# Altium PCB CW341_KintexUSTarget.PcbDoc (part 1 of 7)
Units mil, origin at the board's own origin, x right, y up, seen from the top; angles counter-clockwise.
Board outline 4566.97 x 5485 mil, 6 copper layers (Top Layer, Layer 2 (GND), Layer 3 (sig), Layer 4 (sig), Layer 5 (PWR), Bottom Layer), stack 61.068 mil thick; 157 components, 262 nets, 1869 pads, 1478 vias.
Unrouted connection lines stored in the file: 128.
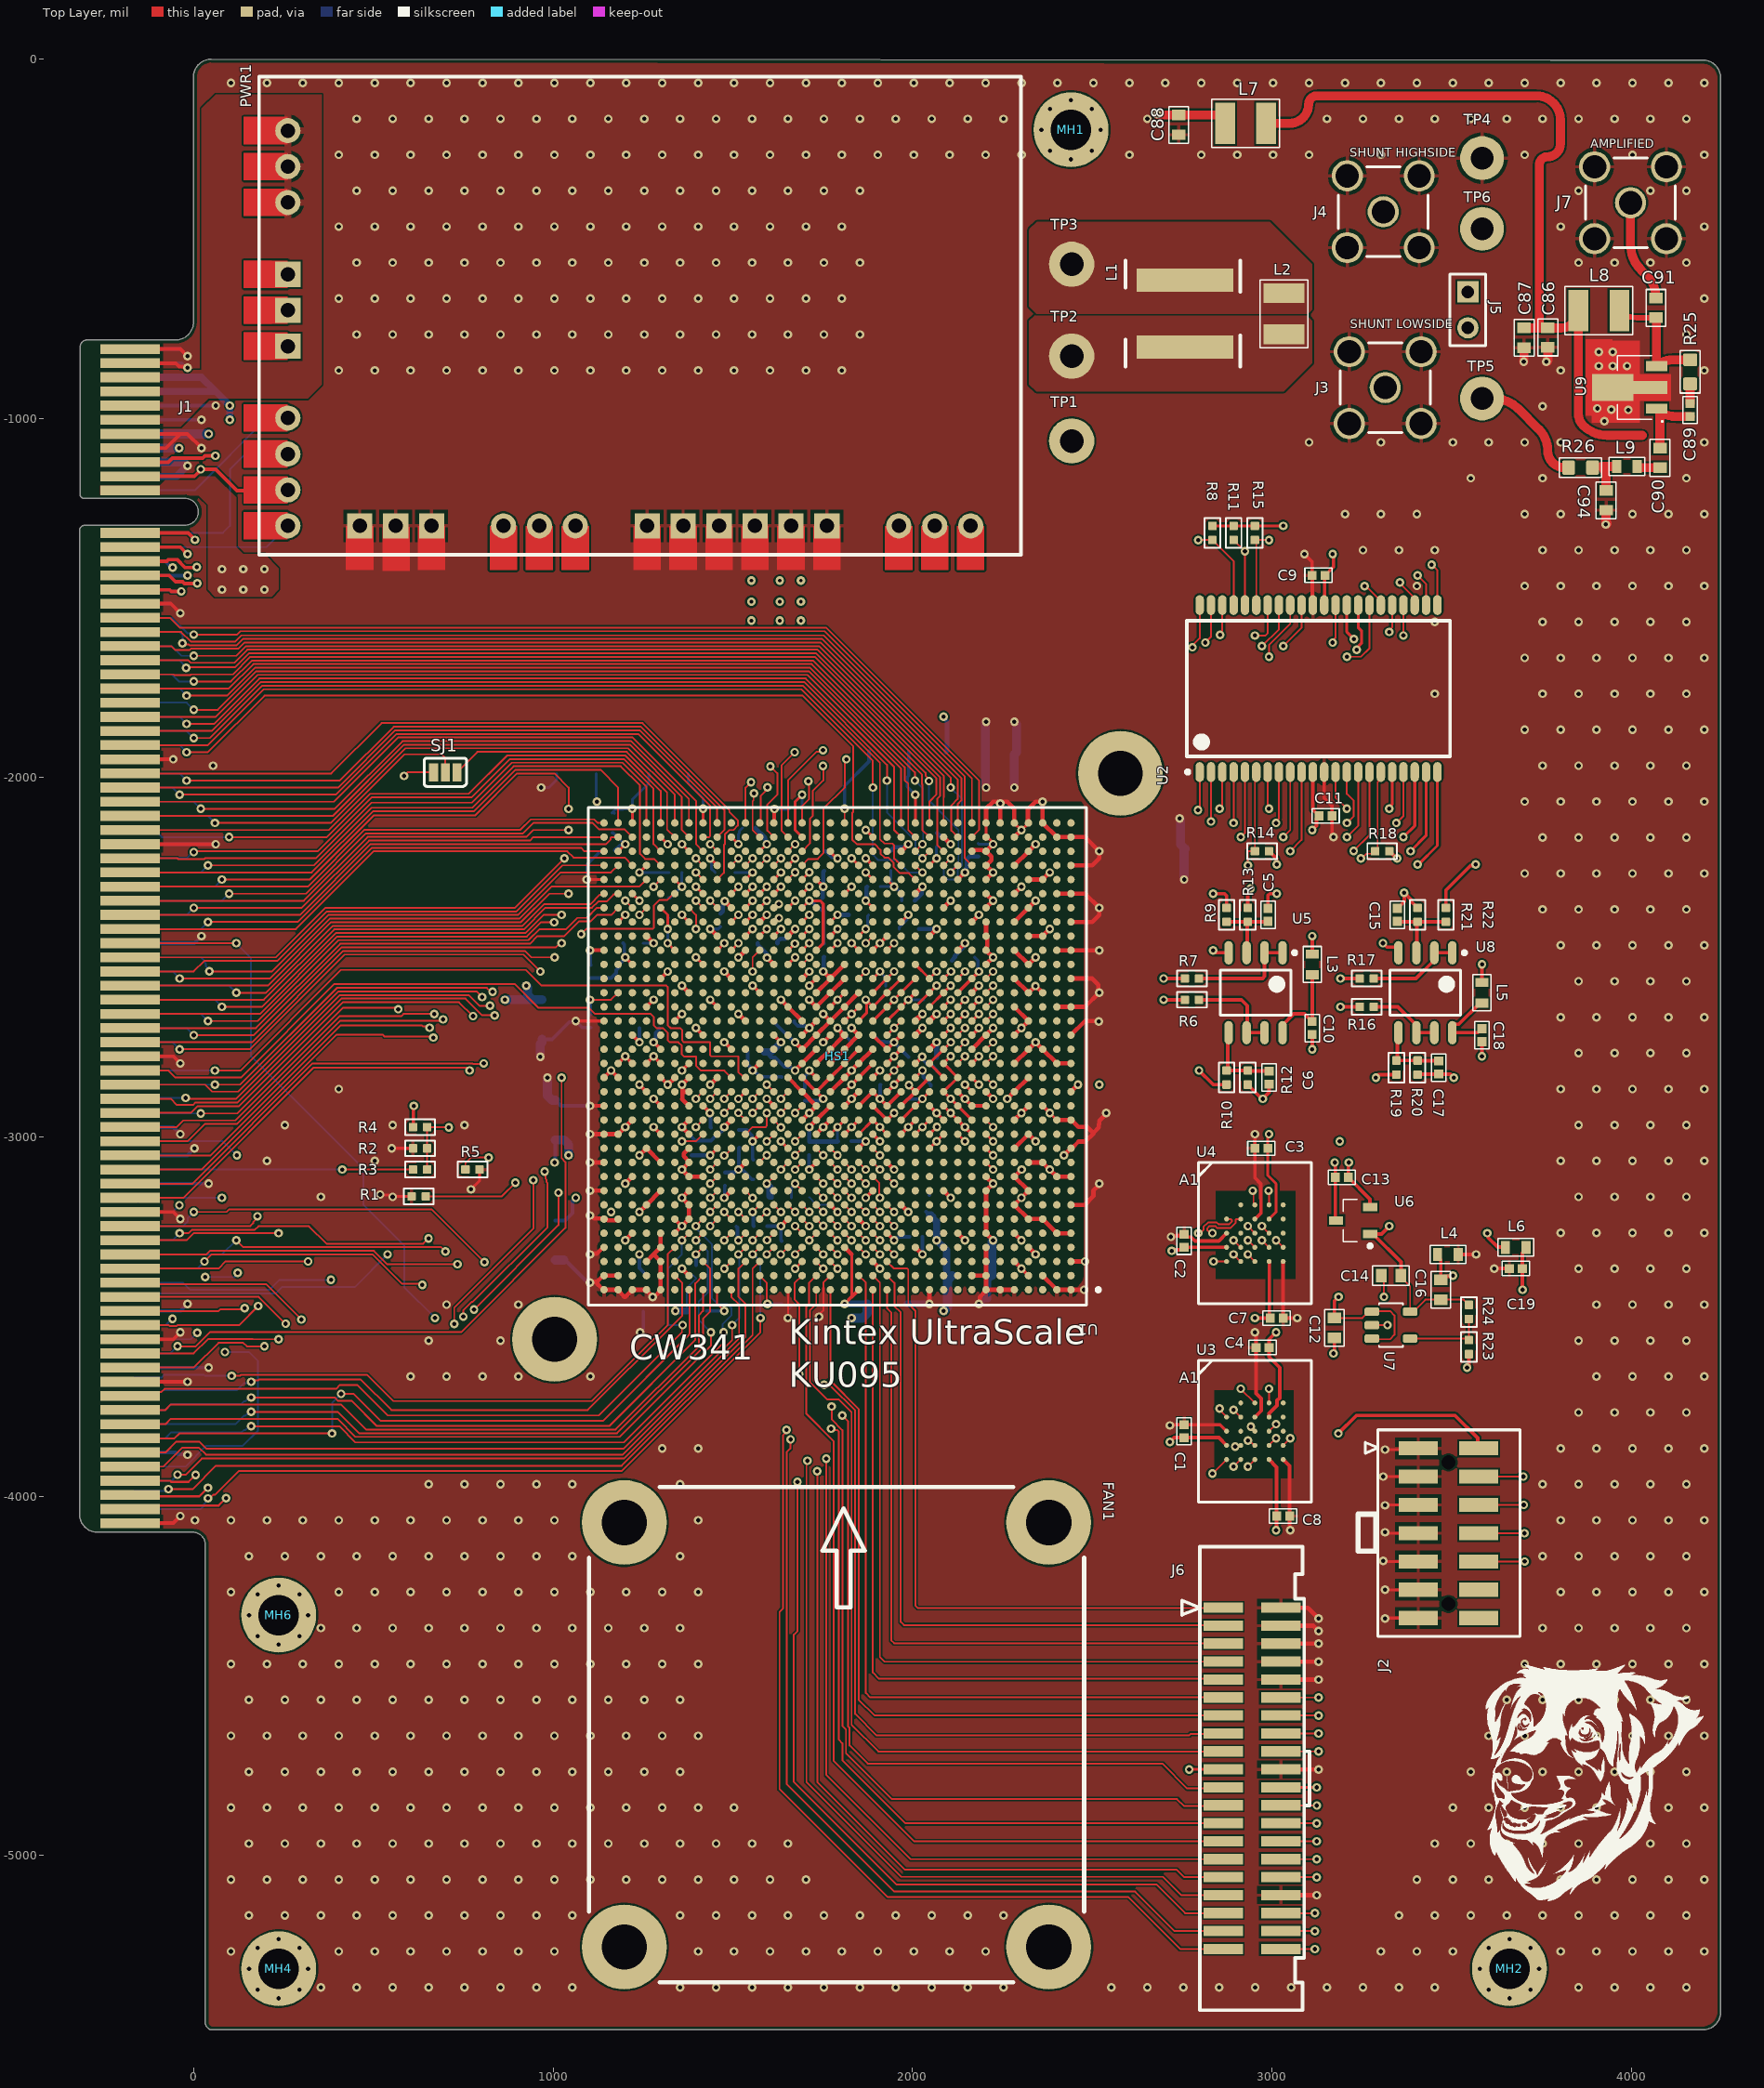
[diagram p0: Top Layer view]
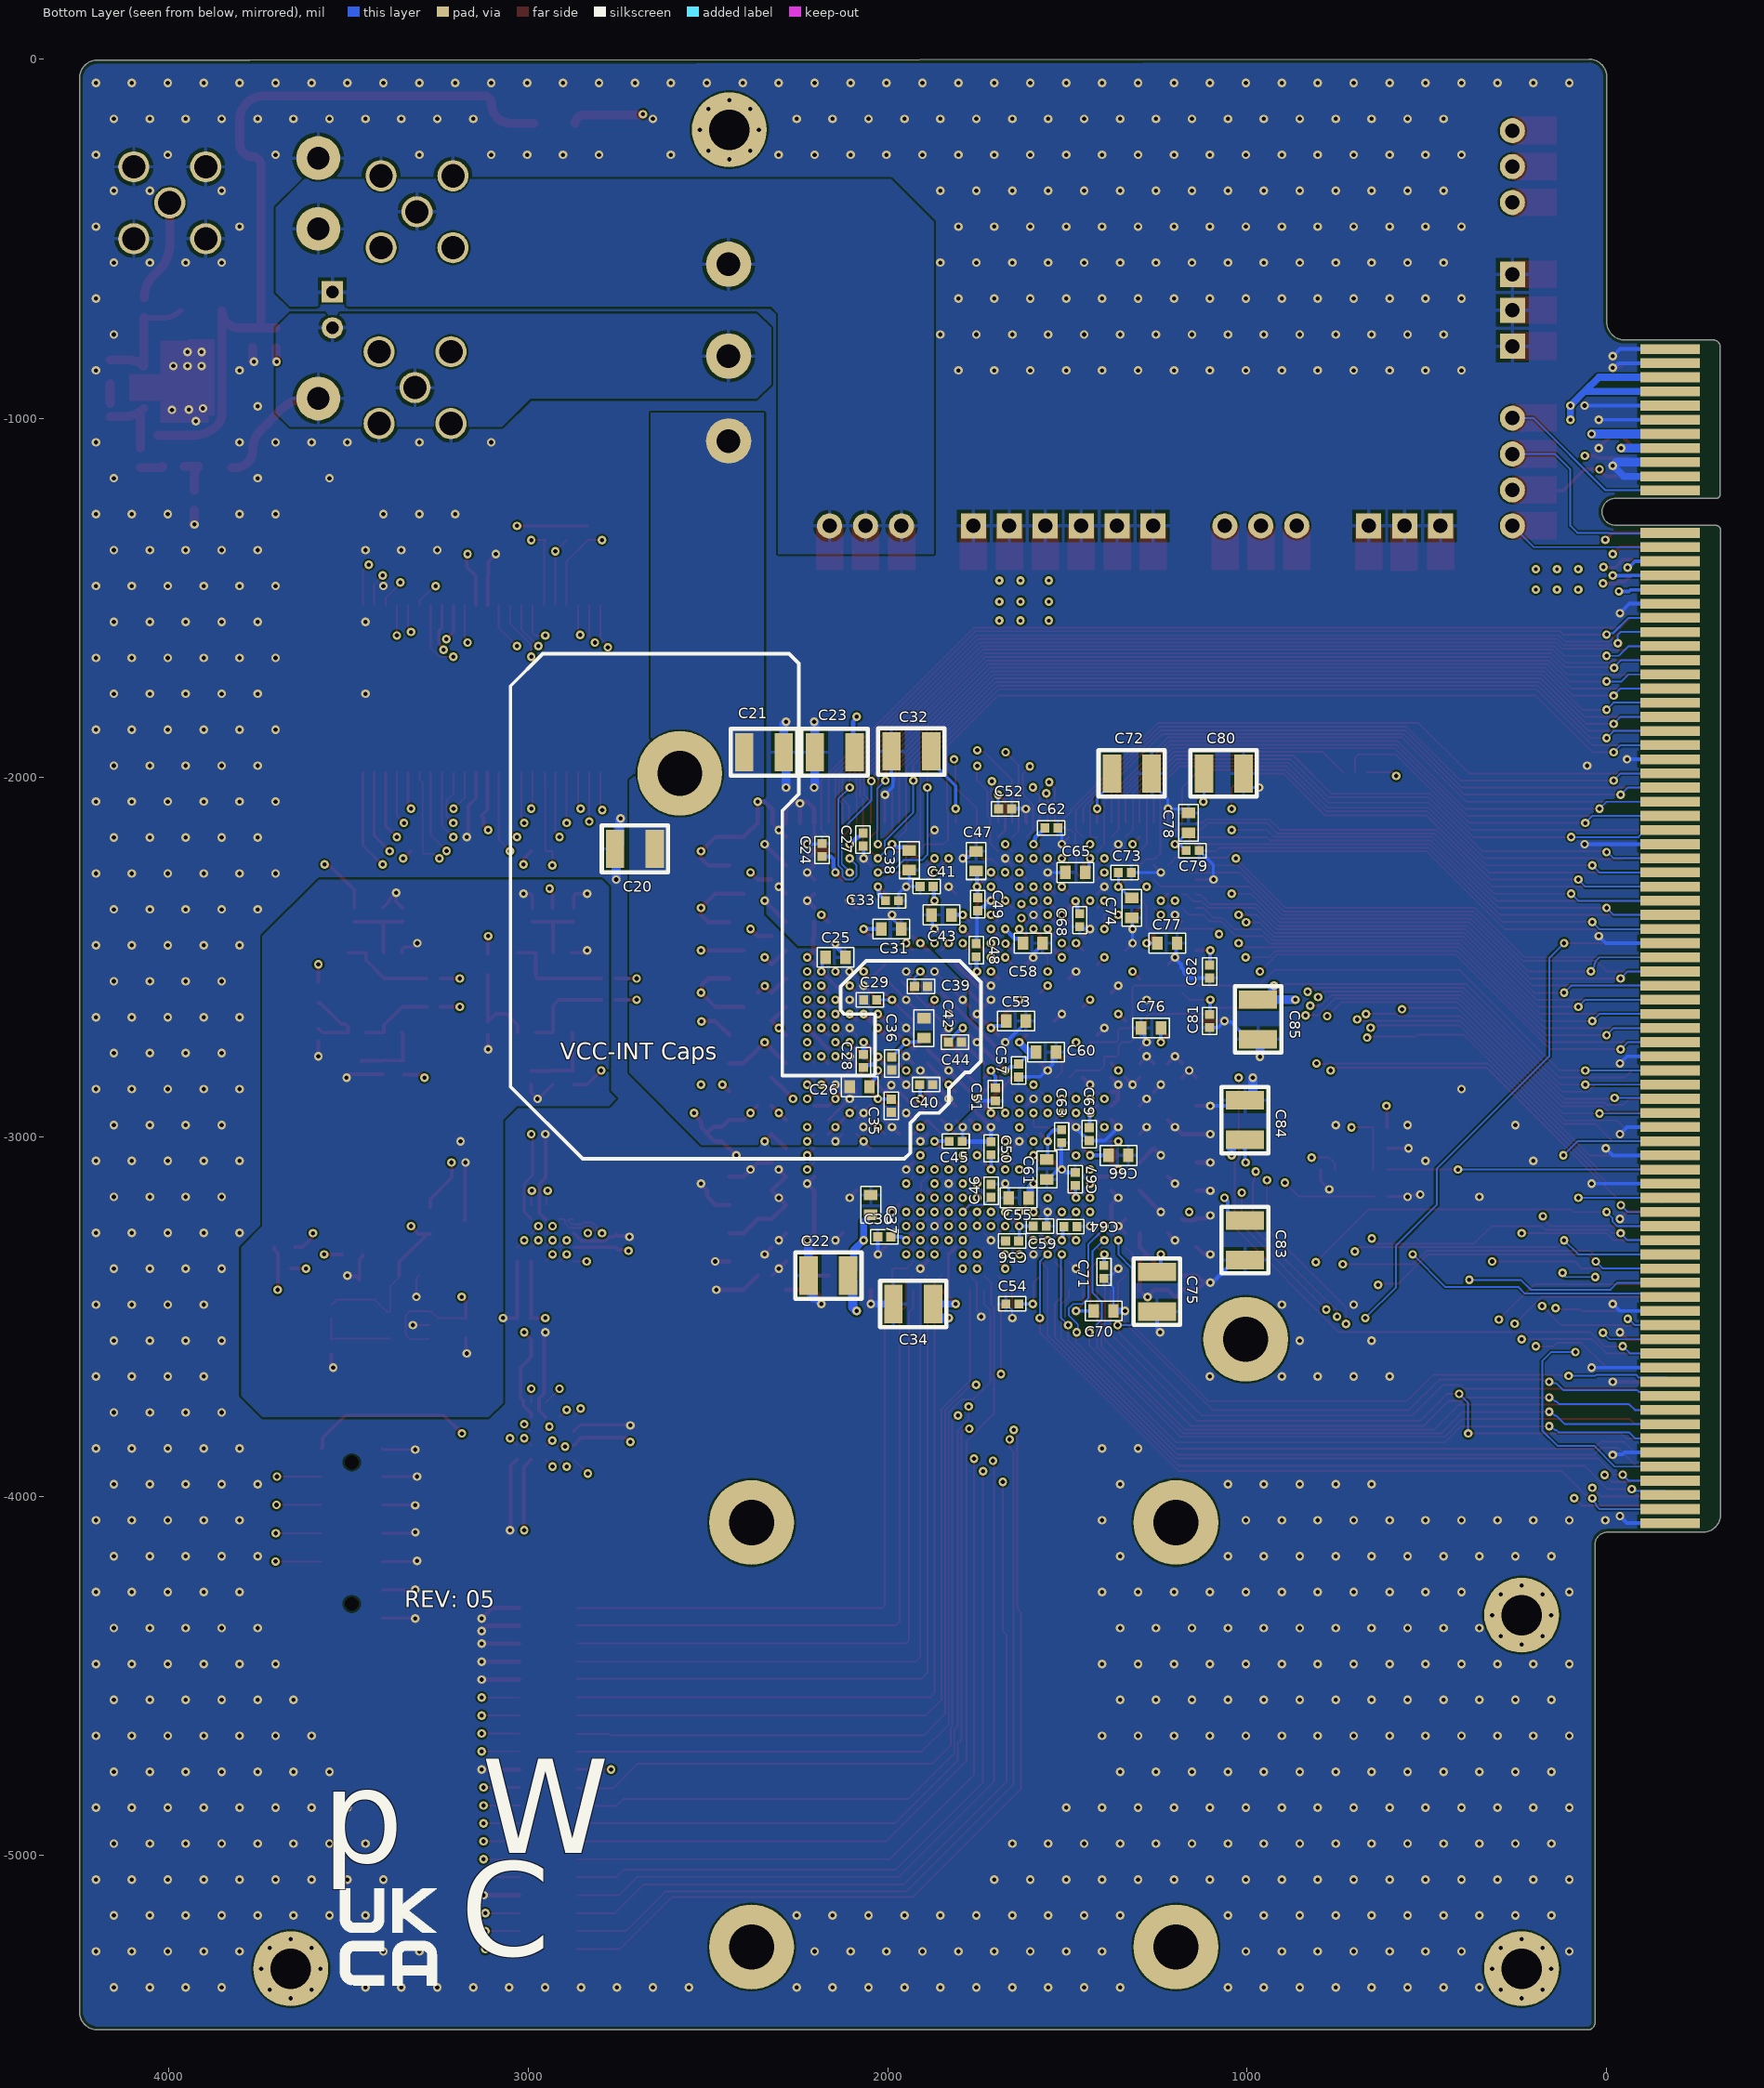
[diagram p1: Bottom Layer view, seen from below]
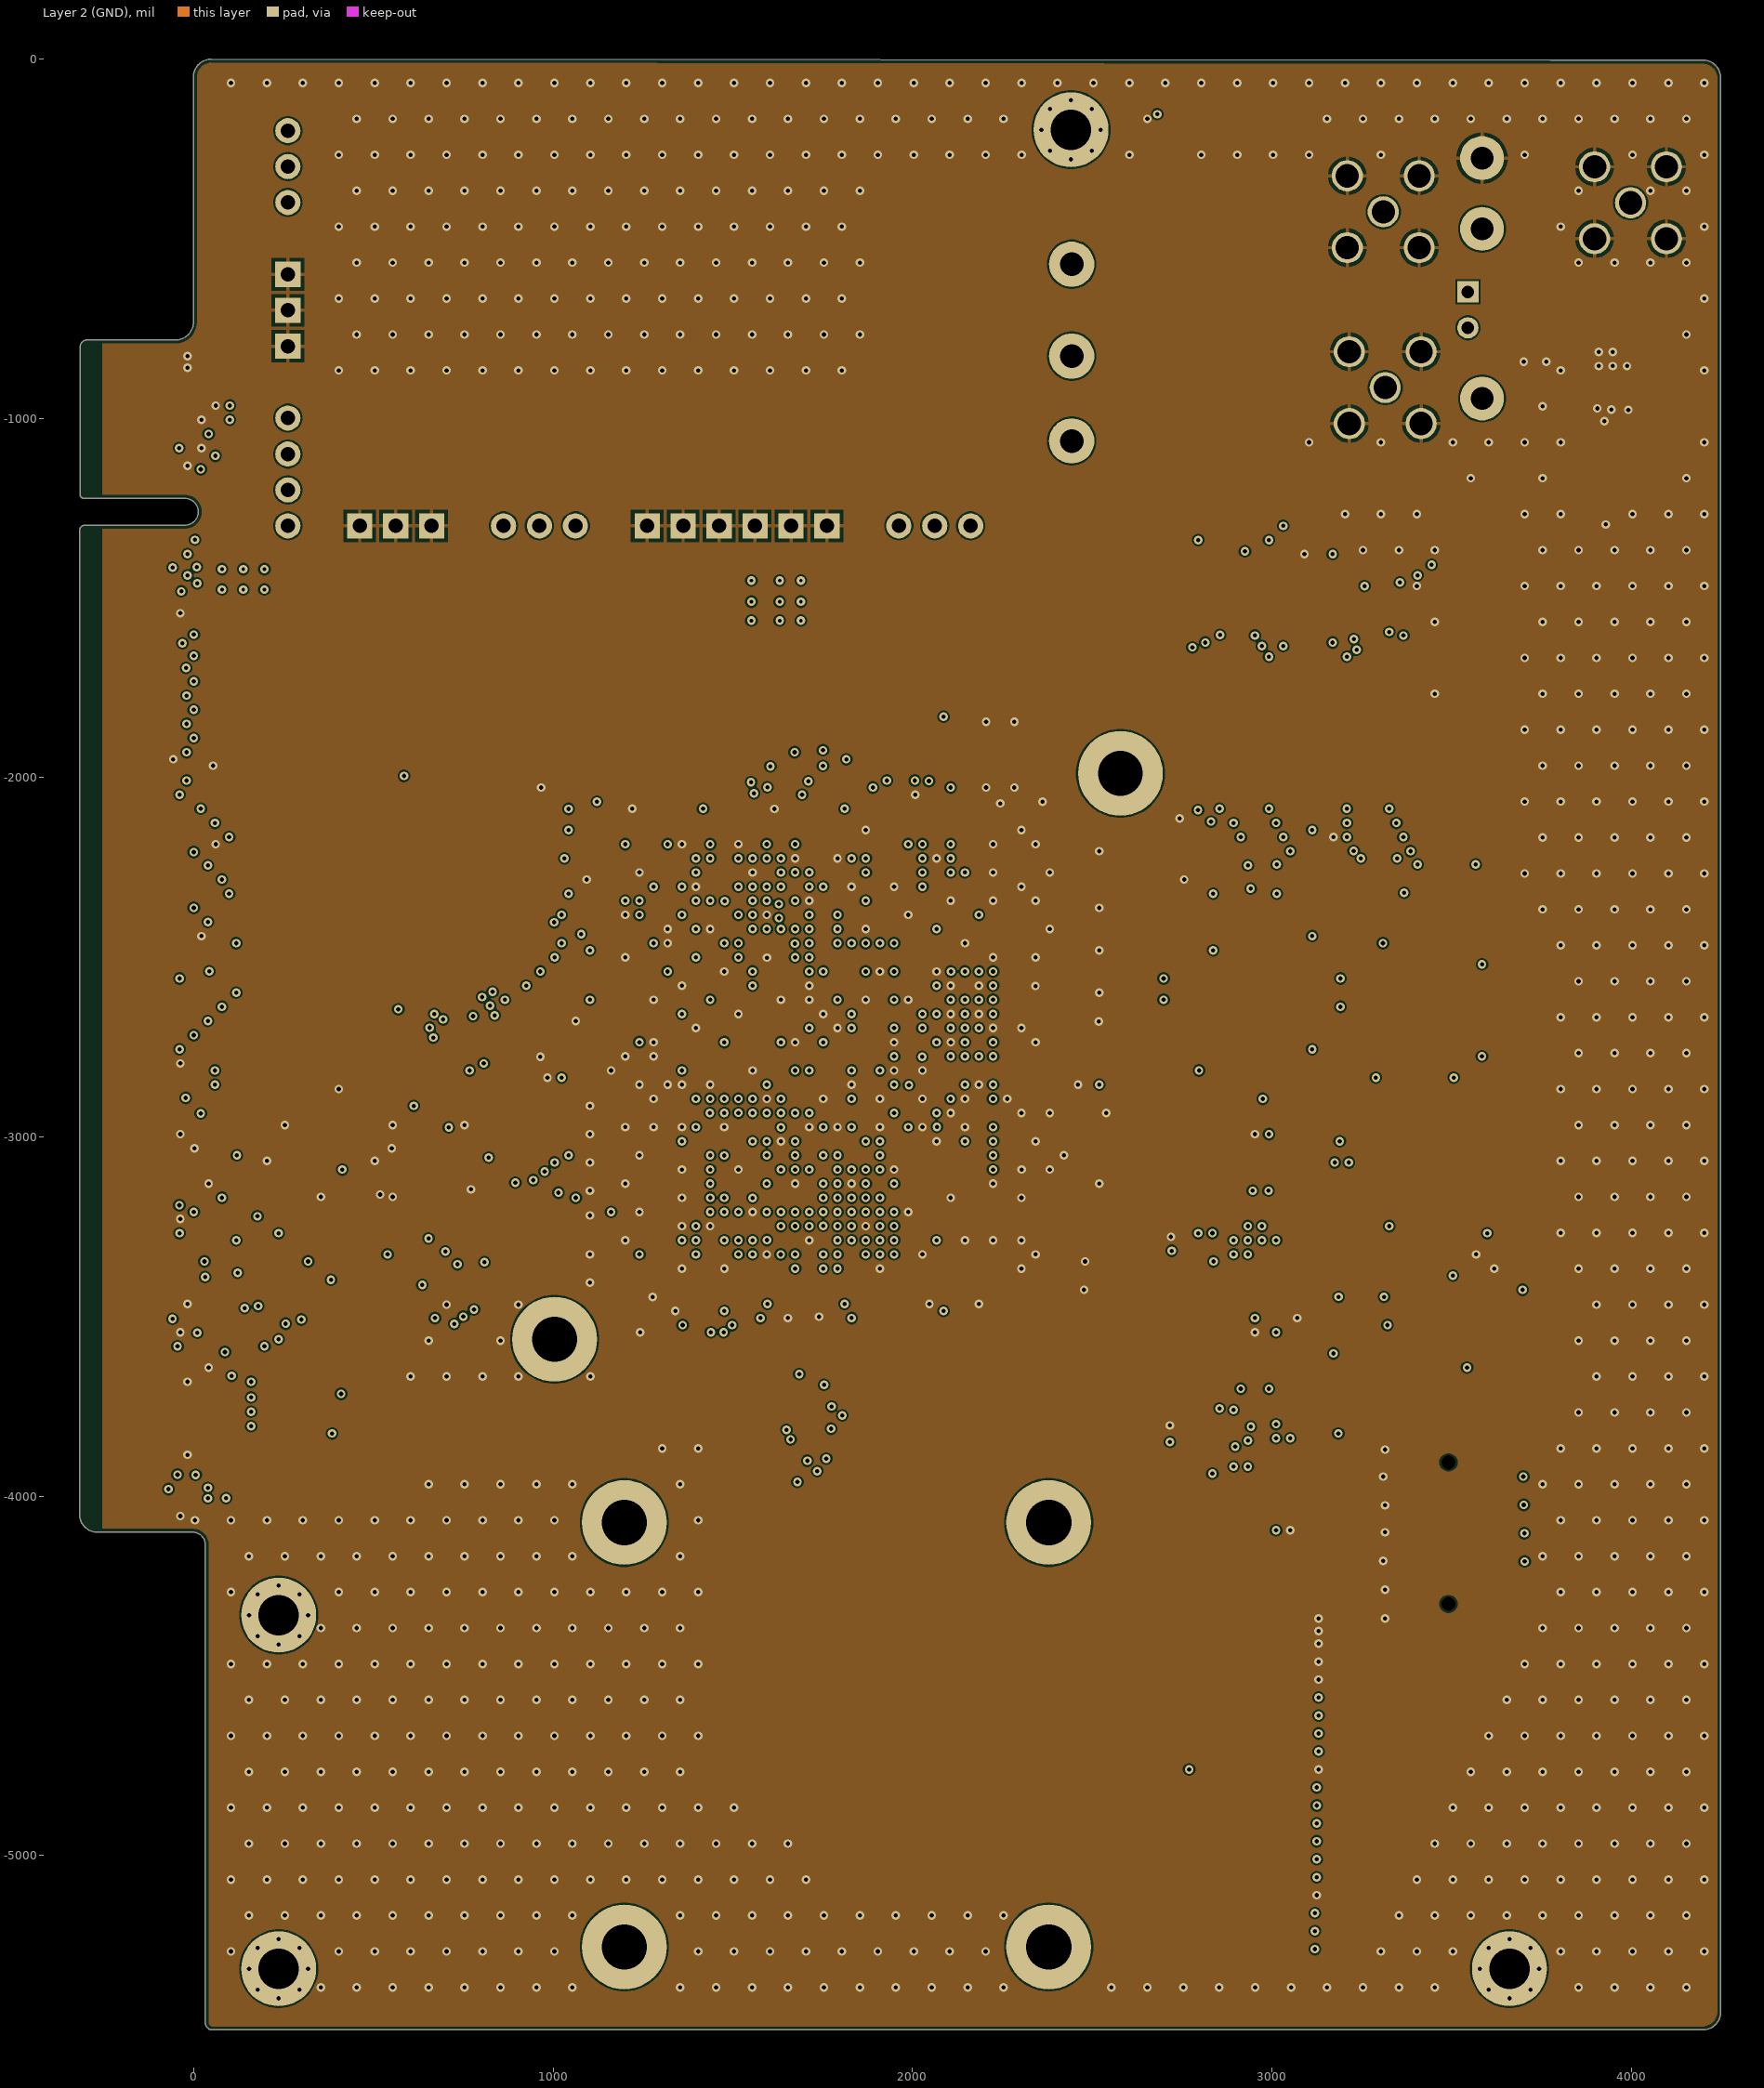
[diagram p2: Layer 2 (GND)]
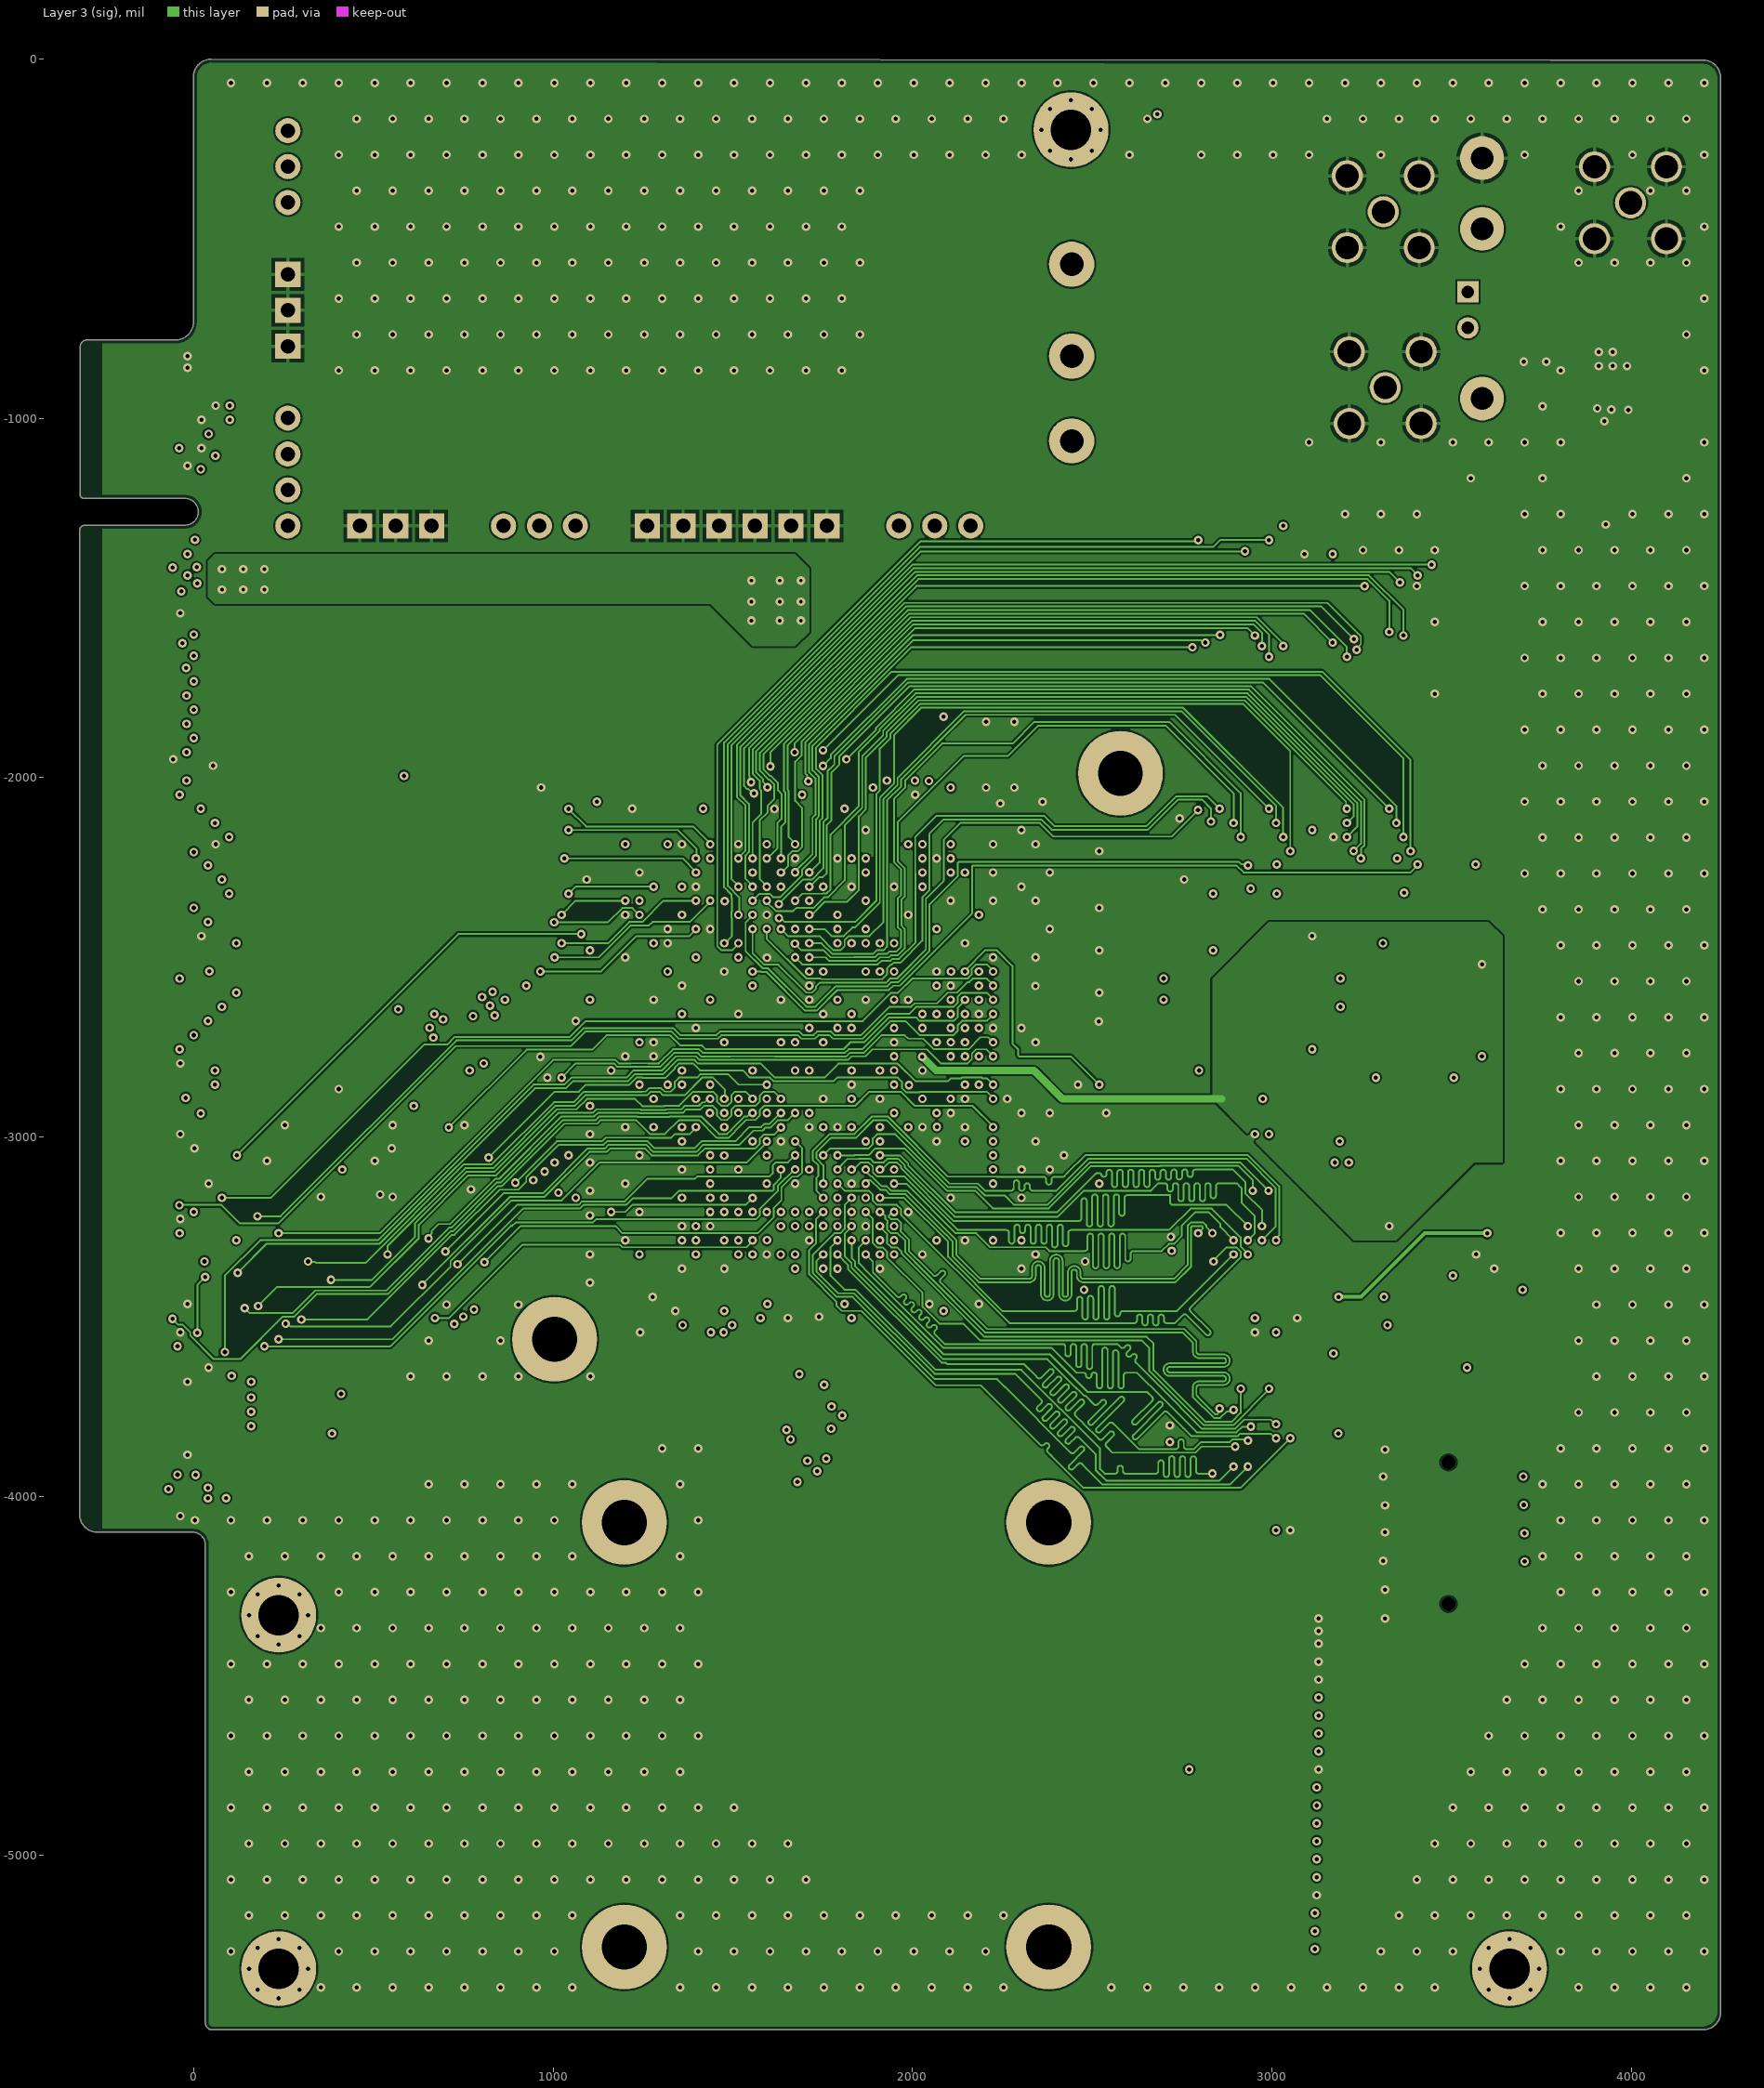
[diagram p3: Layer 3 (sig)]
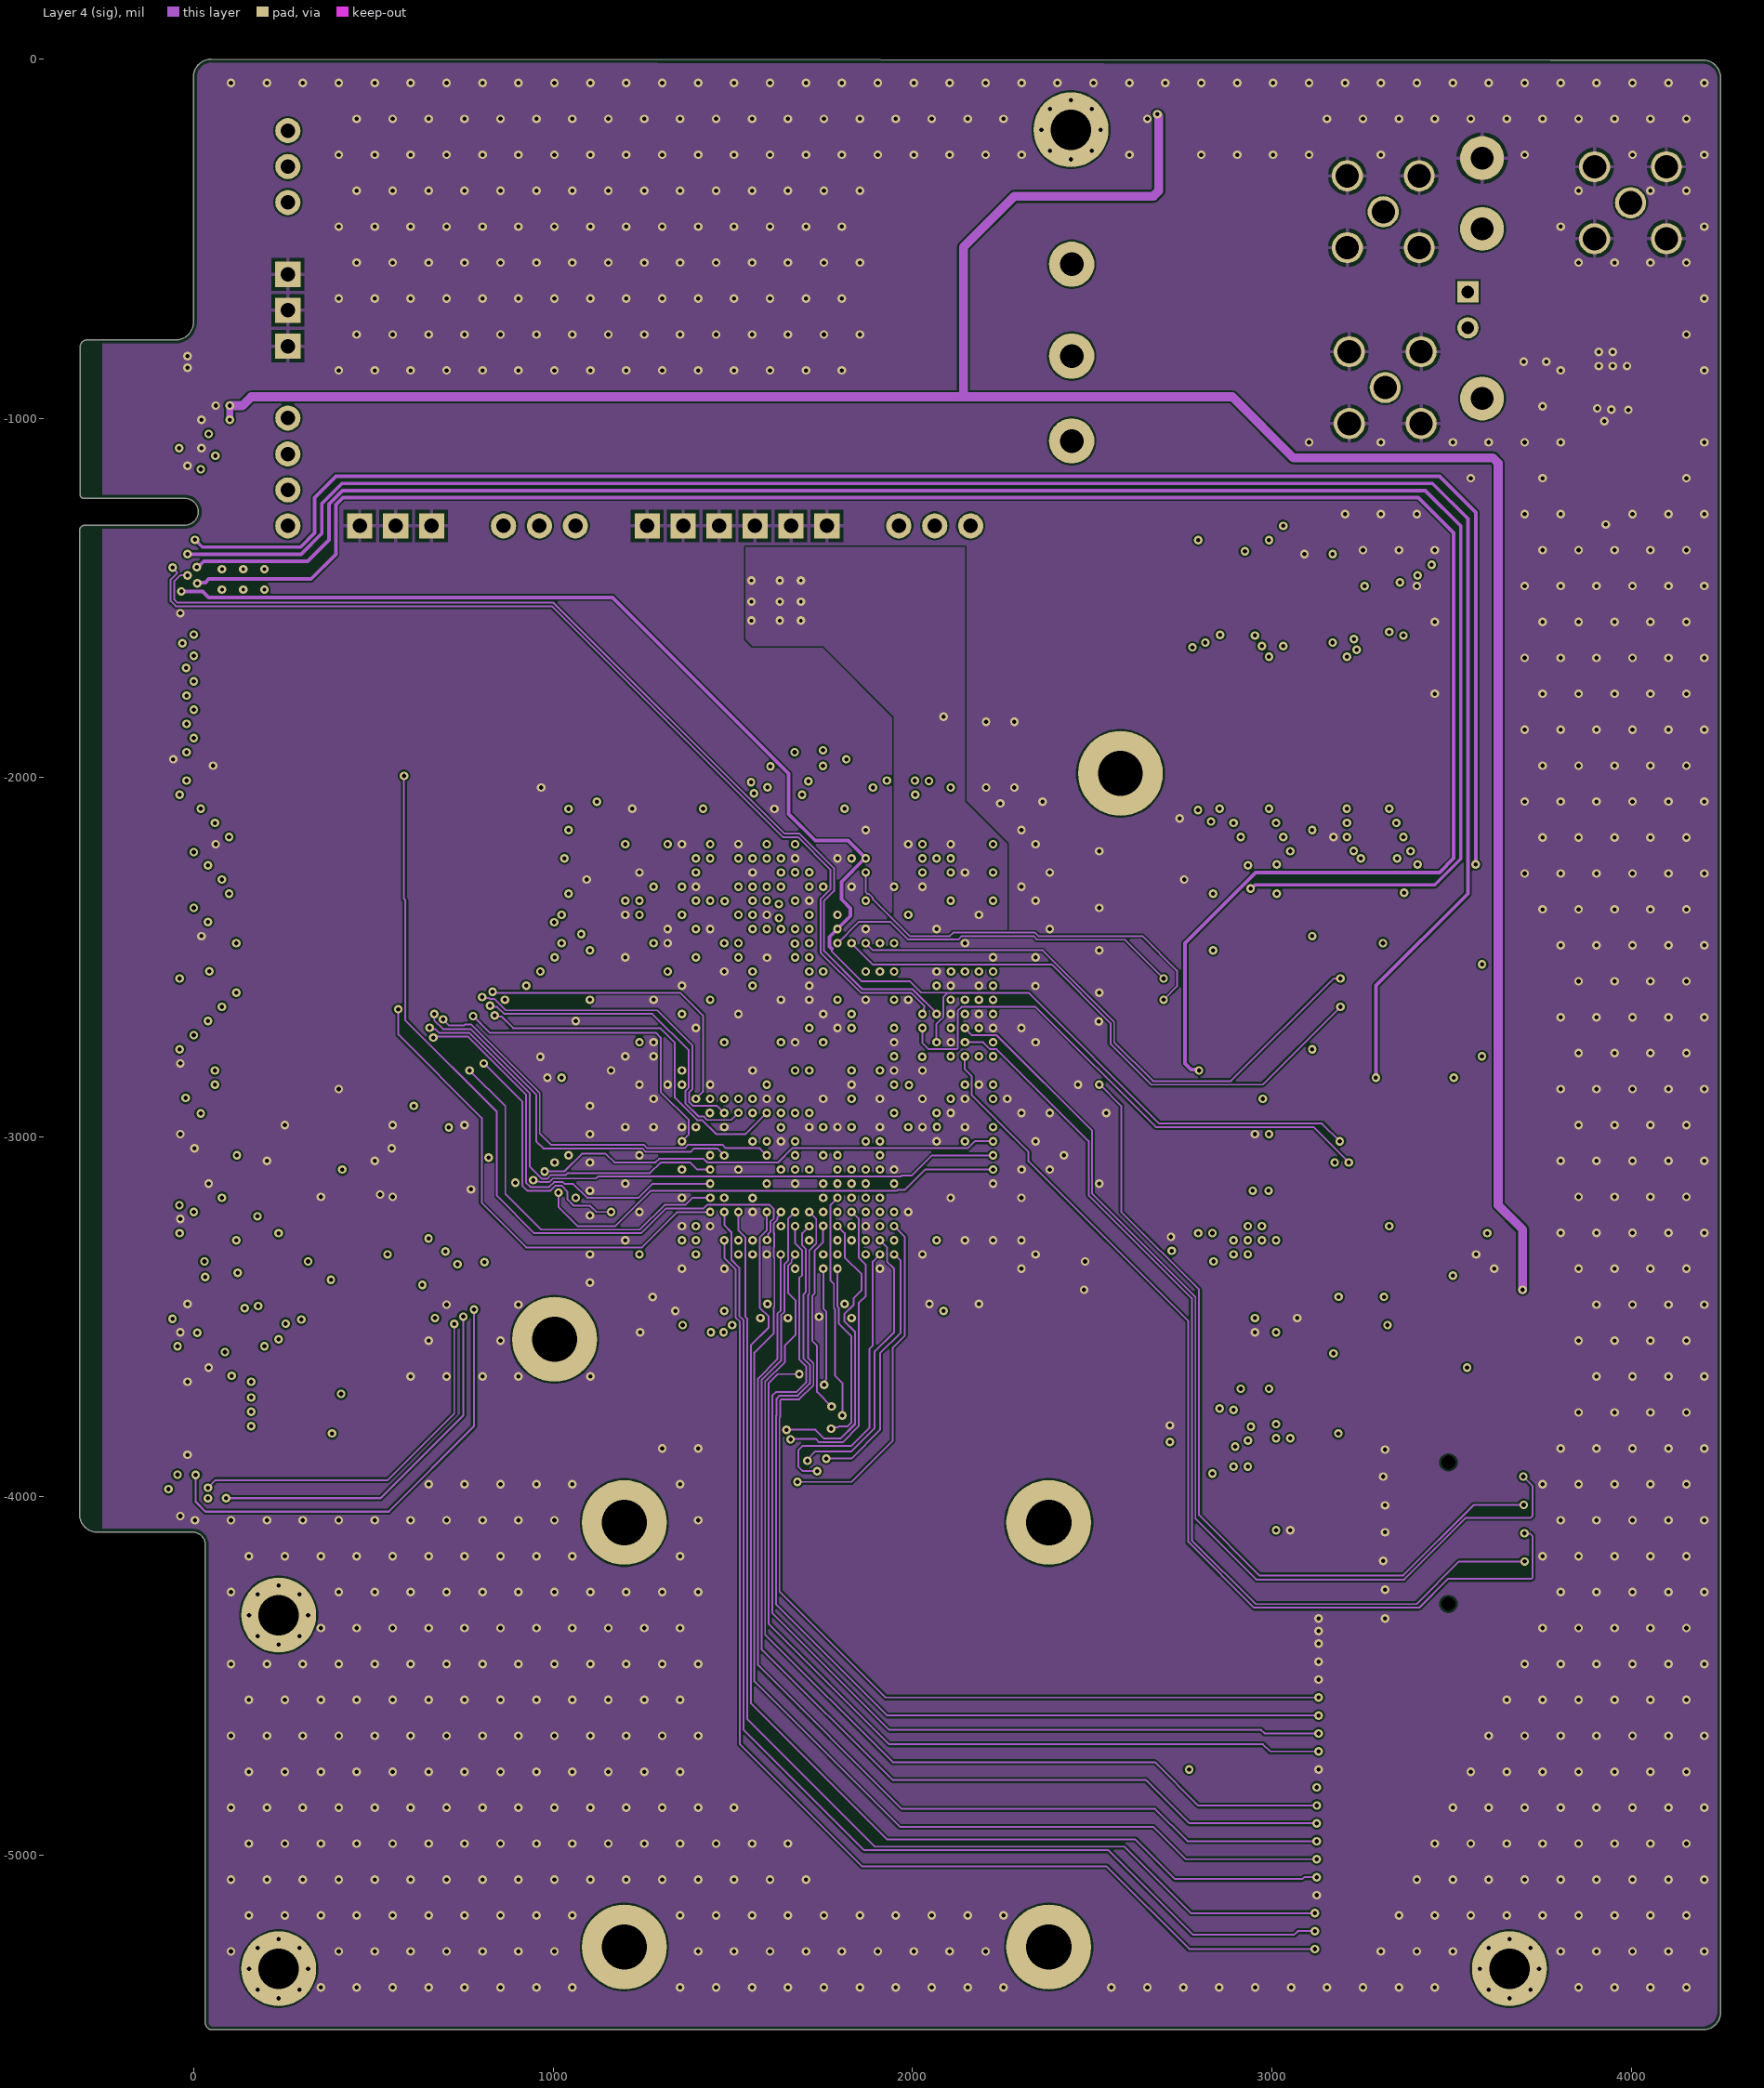
[diagram p4: Layer 4 (sig)]
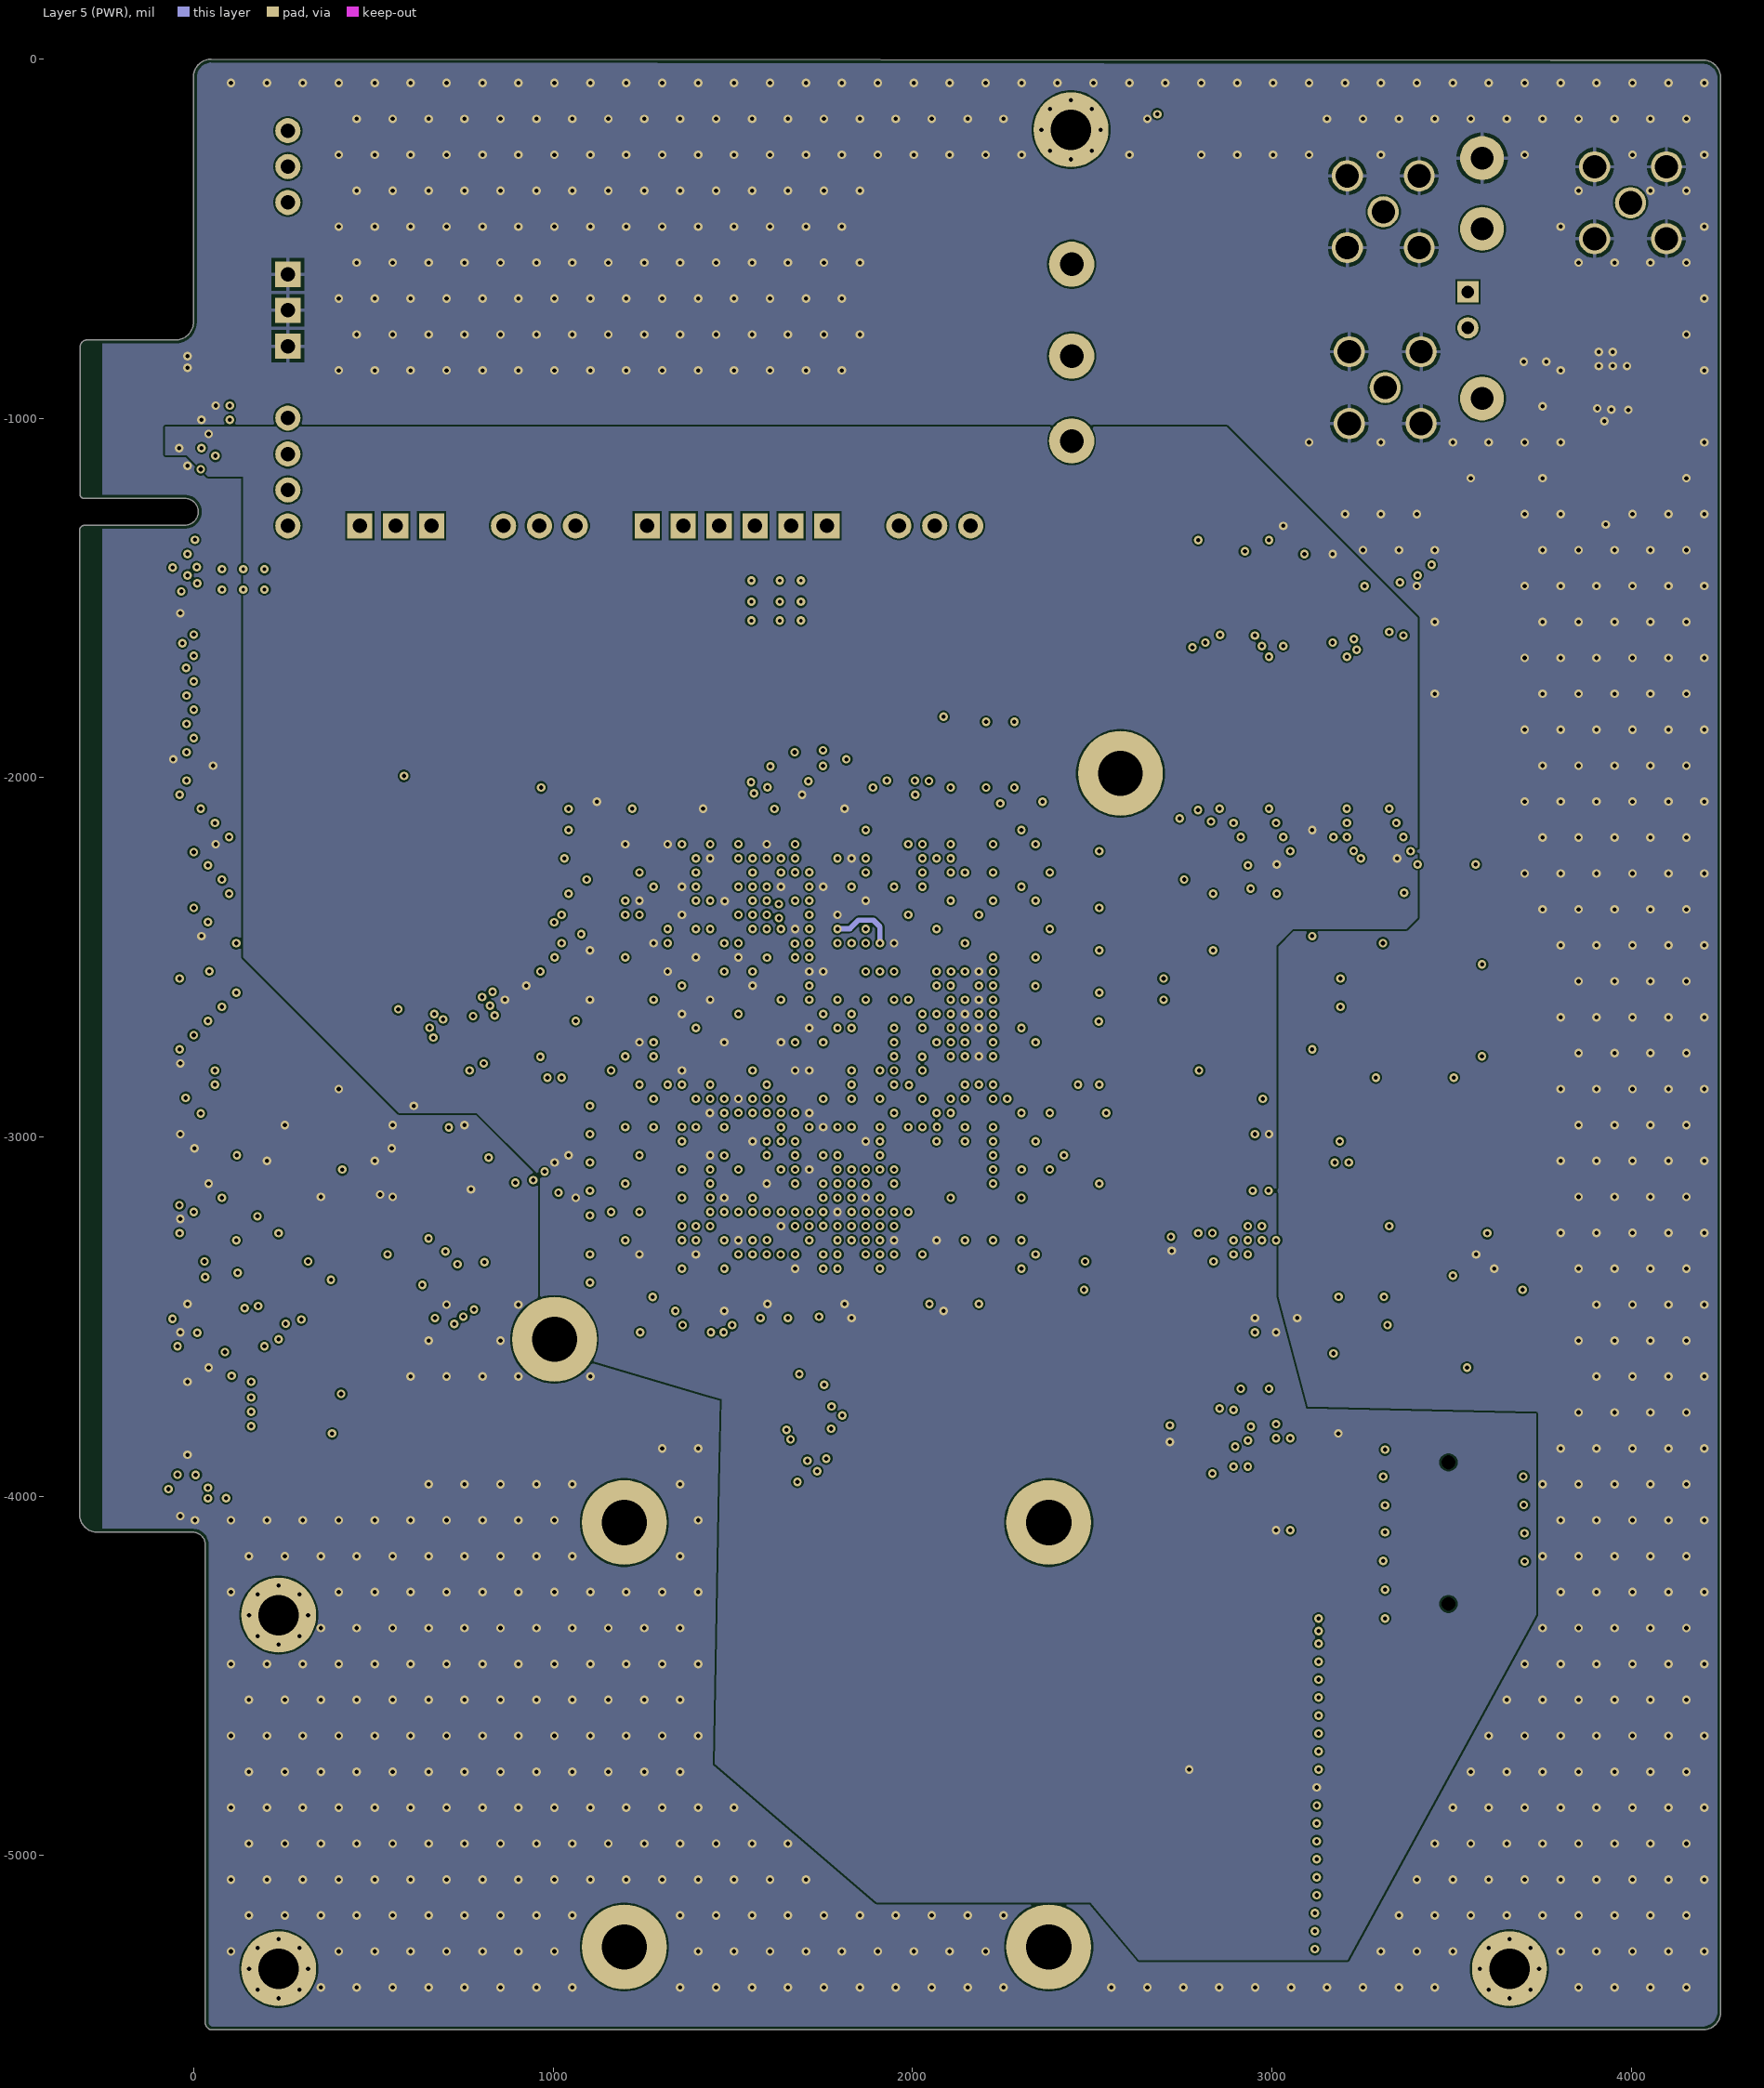
[diagram p5: Layer 5 (PWR)]
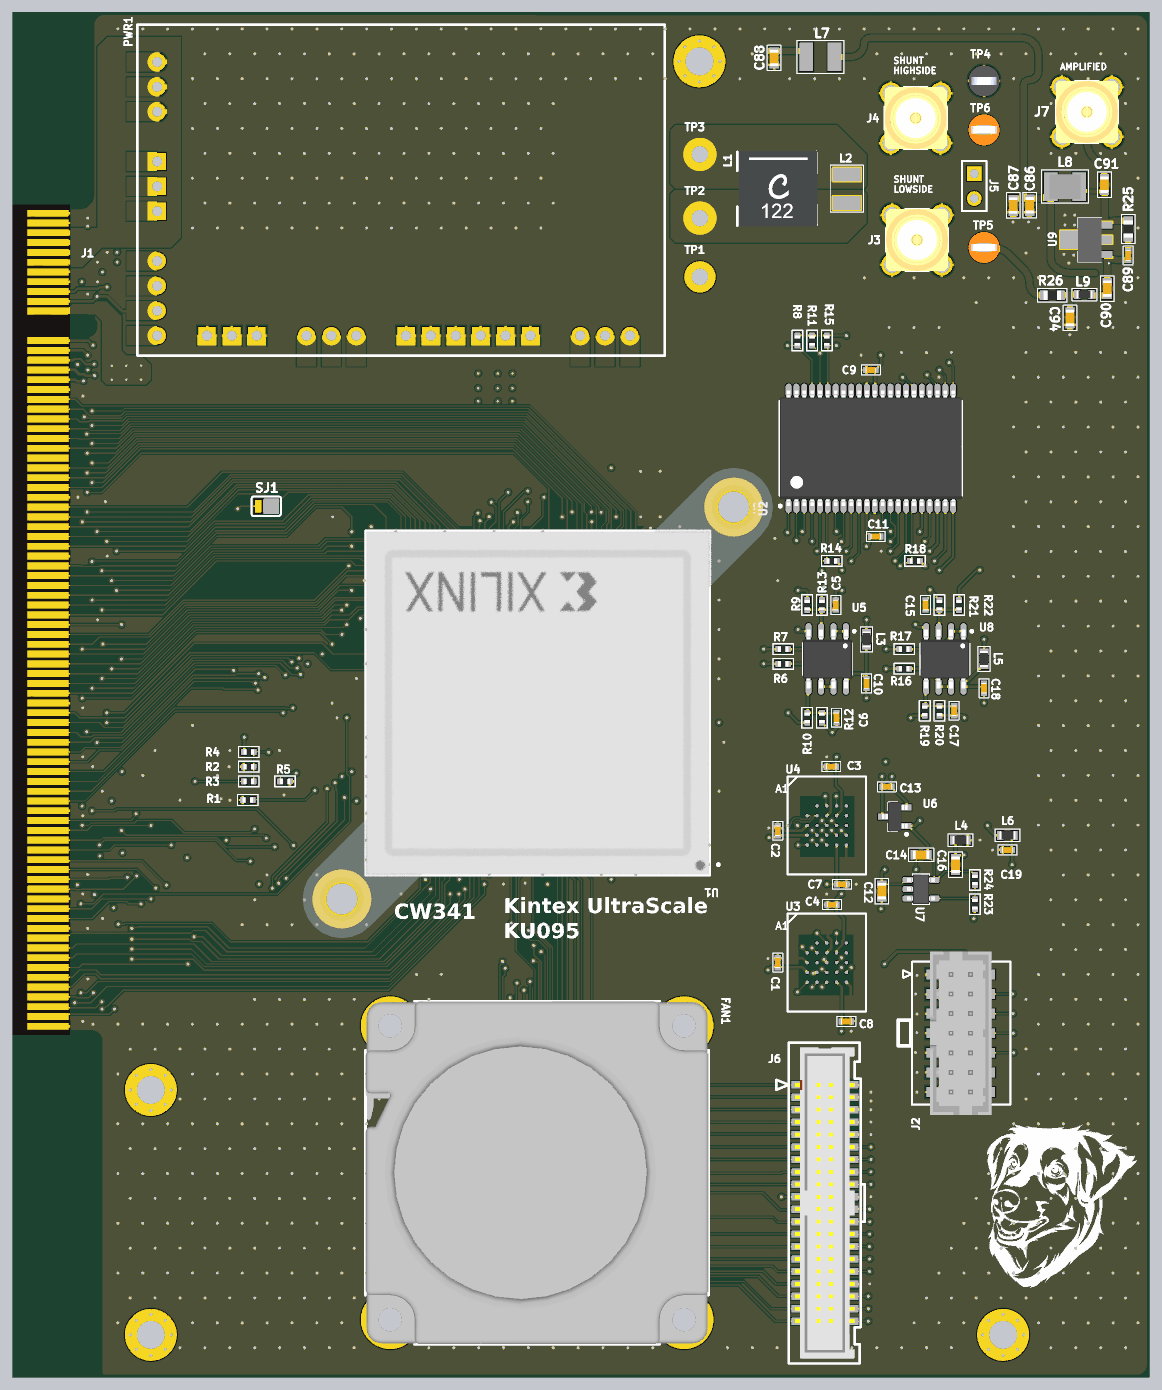
[diagram p11: 3D render of the assembled board from above, using the file's embedded part models]
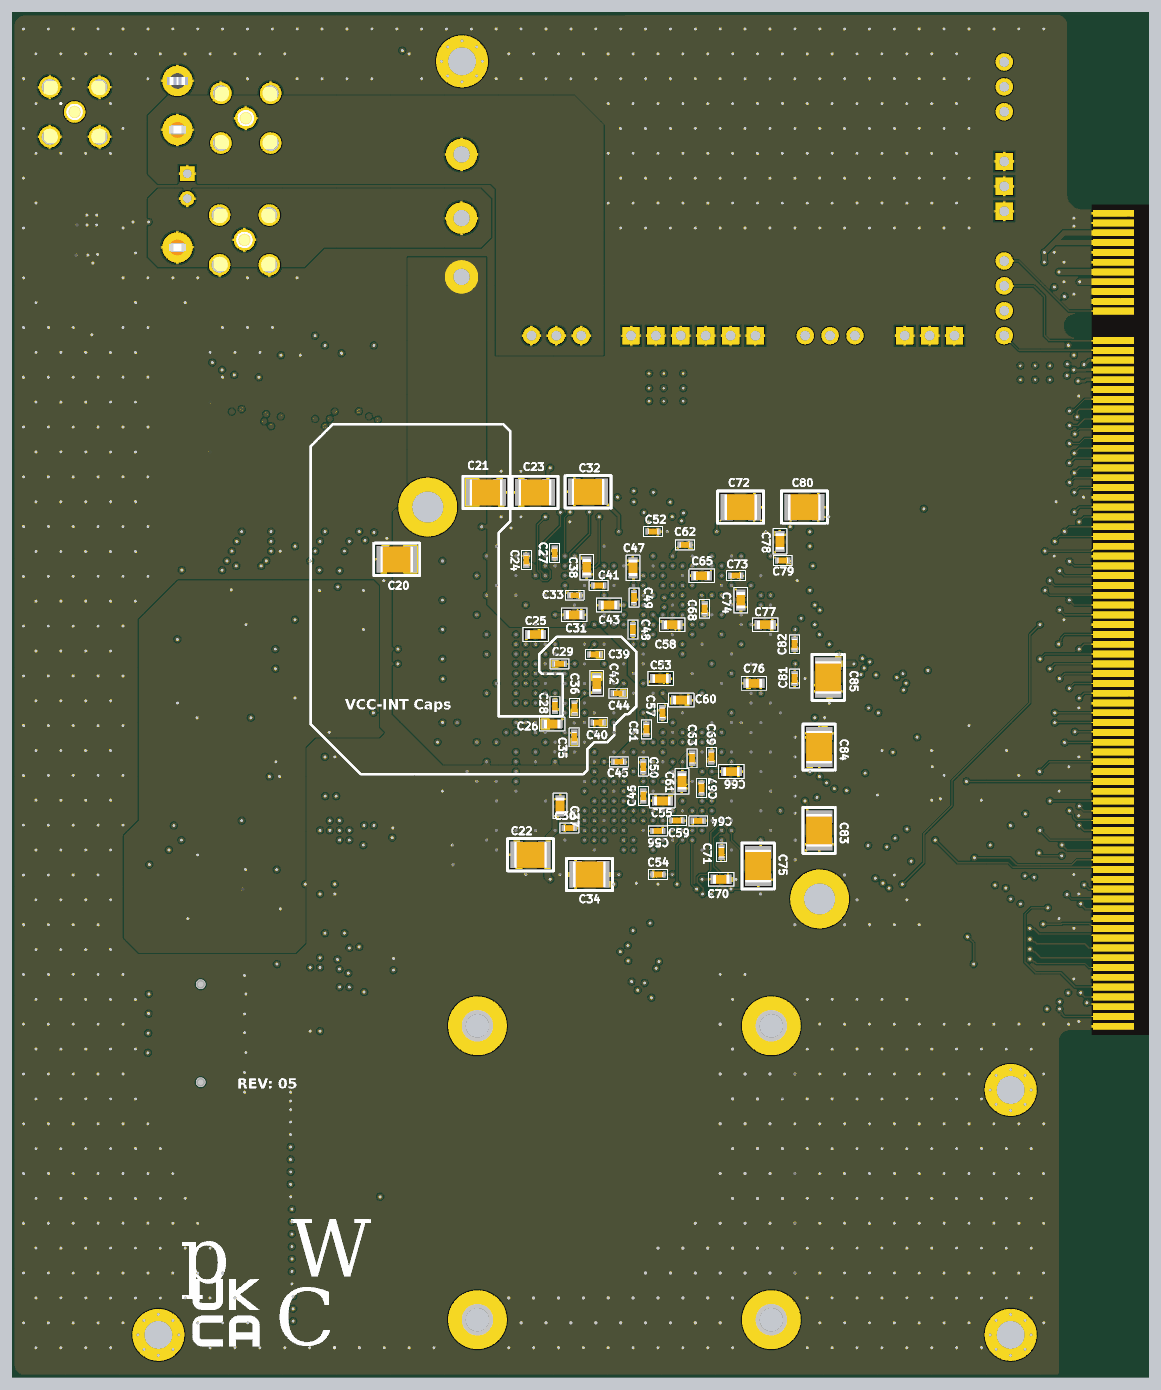
[diagram p12: 3D render of the assembled board from below, using the file's embedded part models]

## Layer stack, top to bottom
Top Solder: solder mask 1, SM-001, Dk 4
Top Layer: signal copper 1.378
Dielectric 1: prepreg 2.8, PP-006, Dk 4.1
Dielectric 2: prepreg 2.8, PP-006, Dk 4.1
Layer 2 (GND): signal copper 1.378
Dielectric 3: core 18, Core-035, Dk 4.7
Layer 3 (sig): signal copper 1.378
Dielectric 4: prepreg 2.8, PP-006, Dk 4.1
Dielectric 5: prepreg 2.8, PP-006, Dk 4.1
Layer 4 (sig): signal copper 1.378
Dielectric 6: core 18, Core-035, Dk 4.7
Layer 5 (PWR): signal copper 1.378
Dielectric 7: prepreg 2.8, PP-006, Dk 4.1
Dielectric 8: prepreg 2.8, PP-006, Dk 4.1
Bottom Layer: signal copper 1.378
Bottom Solder: solder mask 1, SM-001, Dk 4

## Board outline
-317.83,-4050 ccw(c-267.83,-4050) -267.83,-4100 -2.83,-4100 cw(c-2.83,-4135) 32.17,-4135 32.17,-5465 ccw(c52.17,-5465) 52.17,-5485 53.17,-5485 3767.17,-5485 4199.14,-5485 ccw(c4199.14,-5435) 4249.14,-5435 4249.14,-4651.31 4249.14,-71.39 4249.14,-52.83 ccw(c4199.14,-52.83) 4199.14,-2.83 3774.93,-2.83 47.17,0 49.27,0 ccw(c49.27,-50) -0.73,-50 -0.73,-729.32 -0.85,-731.77 cw(c-50.85,-731.77) -50.85,-781.77 -296.43,-781.77 ccw(c-296.43,-801.77) -316.43,-801.77 -316.32,-799.67 -316.32,-1212 ccw(c-305.83,-1211.87) -305.7,-1222.37 -25.45,-1222.37 -24.66,-1222.58 cw(c-24.66,-1259.98) -24.66,-1297.38 -302.83,-1297.4 ccw(c-302.83,-1312.4) -317.83,-1312.4

## Design rules (kind name [scope] priority, off if disabled: settings)
BoardOutlineClearance Silk_to_Outline [(OnLayer('Top Overlay'))] p1: gap=0 ignorepadtopadclearanceinfootprint=FALSE
BoardOutlineClearance [All] p2: gap=10 ignorepadtopadclearanceinfootprint=FALSE
Clearance [All] p1: gap=5 ignorepadtopadclearanceinfootprint=FALSE except(0: Arc-Hole Track-Hole SMDPad-Hole THPad-Hole Via-Hole Fill-Hole Poly-Hole Region-Hole Text-Hole)
DiffPairsRouting [All] p1: maxlimit=15 minlimit=5 mostfreqgap=5 toplayer_minwidth=5 toplayer_maxwidth=15 toplayer_prefwidth=5 midlayer1_minwidth=5 midlayer1_maxwidth=15 midlayer1_prefwidth=5 midlayer2_minwidth=5 midlayer2_maxwidth=15 midlayer2_prefwidth=5 midlayer3_mingap=10 midlayer3_maxgap=10 midlayer3_prefgap=10 midlayer3_minwidth=15 midlayer3_maxwidth=15 midlayer3_prefwidth=15 midlayer4_mingap=10 midlayer4_maxgap=10 midlayer4_prefgap=10 midlayer4_minwidth=15 midlayer4_maxwidth=15 midlayer4_prefwidth=15 bottomlayer_minwidth=5 bottomlayer_maxwidth=15 bottomlayer_prefwidth=5 maxuncoupledlength=500
HoleSize [All] p1: absolutevalues=TRUE maxlimit=200 minlimit=1 maxpercent=80.000 minpercent=20.000
MatchedLengths Hyper2_clock [InDifferentialPair('HYPR_2')] p1: tolerance=10 checknetsindiffpair=FALSE checkdiffpairvsdiffpair=TRUE checkxsignals=TRUE checkothers=TRUE
MatchedLengths Hyper2_Signals [InNetClass('HYPER_2_Length')] p2: tolerance=15 checknetsindiffpair=FALSE checkdiffpairvsdiffpair=TRUE checkxsignals=TRUE checkothers=TRUE
MatchedLengths Hyper1_clock [InNetClass('HYPER_1_Clks')] p3: tolerance=10 checknetsindiffpair=FALSE checkdiffpairvsdiffpair=TRUE checkxsignals=TRUE checkothers=TRUE
MatchedLengths Hyper1_Signals [InNetClass('HYPER_1_Length')] p4: tolerance=15 checknetsindiffpair=FALSE checkdiffpairvsdiffpair=TRUE checkxsignals=TRUE checkothers=TRUE
MinimumSolderMaskSliver [All] p1 off: minsoldermaskwidth=10
PlaneConnect PlaneConnect_viaDirect [IsVia] p1: planeconnectstyle=Direct reliefexpansion=20 reliefentries=4 reliefconductorwidth=10 reliefairgap=10
PlaneConnect [All] p2: planeconnectstyle=Relief reliefexpansion=20 reliefentries=4 reliefconductorwidth=10 reliefairgap=10
PolygonConnect PolygonConnect_2 [All vs IsNamedPolygon('+VCCIOB_L01_P008') or IsNamedPolygon('+1V0_VCCINT_L06_P001') or IsNamedPolygon('+1V0_VCCINT_SHUNTLOW_L01_P004') or IsNamedPolygon('NETJ3_1_L01_P005')] p1: connectstyle=Direct reliefconductorwidth=10 reliefentries=4 polygonreliefangle="90 Angle" airgapwidth=10
PolygonConnect PolygonConnect_1 [All vs IsNamedPolygon('+5V_L01_P000')] p2: thpad.connectstyle=Relief thpad.reliefconductorwidth=20 thpad.reliefentries=4 thpad.polygonreliefangle="90 Angle" thpad.airgapwidth=10 smdpad.connectstyle=Relief smdpad.reliefconductorwidth=20 smdpad.reliefentries=4 smdpad.polygonreliefangle="90 Angle" smdpad.airgapwidth=10 via.connectstyle=Relief via.reliefconductorwidth=10 via.reliefentries=4 via.polygonreliefangle="90 Angle" via.airgapwidth=10
PolygonConnect PolygonConnect_viaDirect [All vs isVia] p3: connectstyle=Direct reliefconductorwidth=10 reliefentries=4 polygonreliefangle="90 Angle" airgapwidth=10
PolygonConnect [All] p4: connectstyle=Relief reliefconductorwidth=10 reliefentries=4 polygonreliefangle="90 Angle" airgapwidth=10
RoutingVias [All] p1: holewidth=12 width=24 viastyle="Through Hole" minholewidth=12 minwidth=24 maxholewidth=28 maxwidth=50 viatemplateguid#1={088292EF-4834-4FA0-84A5-495A3CA15AB3} viatemplatename#1=v61h30m0mx0
SilkToSilkClearance [All] p1: silktosilkclearance=5
SilkToSolderMaskClearance [IsPad] p1: minsilkscreentomaskgap=5 clearancetoexposedcopper=TRUE
SolderMaskExpansion [All] p1: expansion=4 istentingtop=FALSE
Width [All] p1: maxlimit=100 minlimit=5 preferedwidth=5 toplayer_prefwidth=8 midlayer3_minwidth=10 midlayer3_maxwidth=10 midlayer3_prefwidth=10 midlayer4_maxwidth=10 minimp=50.000000 maximp=50.000000 favimp=50.000000
24 further rules are at their usual default settings.

## Classes and differential pairs
component class CW341_FPGAIO_1: SJ1
component class CW341_FPGA_USERIOA: J6
net class HYPER_2_Length: HYPR_2_DQ0 HYPR_2_DQ1 HYPR_2_DQ2 HYPR_2_DQ3 HYPR_2_DQ4 HYPR_2_DQ5 HYPR_2_DQ6 HYPR_2_DQ7 HYPR_2_N HYPR_2_P HYPR_2_RWDS
net class HYPER_2_Clks: HYPR_2_N HYPR_2_P
net class HYPER_1_Clks: HYPR_1_N HYPR_1_P
net class HYPER_1_Length: HYPR_1_DQ0 HYPR_1_DQ1 HYPR_1_DQ2 HYPR_1_DQ3 HYPR_1_DQ4 HYPR_1_DQ5 HYPR_1_DQ6 HYPR_1_DQ7 HYPR_1_N HYPR_1_P HYPR_1_RWDS
differential pair class HR_2: HYPR_2
differential pair class HR_1: HYPR_1
differential pair class ANALOG: XADC_DX XADC_VREF
component class CW341_XADC: C5 C6 C10 C12 C13 C14 C15 C16 C17 C18 C19 L3 L4 L5 L6 R6 R7 R9 R10 R12 R13 R16 R17 R19 R20 R21 R22 R23 R24 U5 U6 U7 U8
component class CW341_PowerMeasure: C86 C87 C88 C89 C90 C91 C94 J3 J4 J5 J7 L1 L2 L7 L8 L9 R25 R26 TP1 TP2 TP3 TP4 TP5 TP6 U9
component class CW341_HyperRam: C1 C2 C3 C4 C7 C8 U3 U4
component class CW341_FPGAIO_3: R1
component class CW341_FPGA_PWR: C28 PWR1 U1
component class CW341_FPGA_CFG: J2 R2 R3 R4 R5
component class CW341_Edge: J1
component class CW341_SRAM: C9 C11 R8 R11 R14 R15 R18 U2
component class CW341_HeatsinkFan: FAN1 HS1 MH1 MH2 MH4 MH6
component class CW341_FPGA_DECOUP: C20 C21 C22 C23 C24 C25 C26 C27 C29 C30 C31 C32 C33 C34 C35 C36 C37 C38 C39 C40 C41 C42 C43 C44 C45 C46 C47 C48 C49 C50 C51 C52 C53 C54 C55 C56 C57 C58 C59 C60 C61 C62 C63 C64 C65 C66 C67 C68 C69 C70 C71 C72 C73 C74 C75 C76 C77 C78 C79 C80 C81 C82 C83 C84 C85
differential pair XADC_VREF: +XADC_VREF_P -XADC_VREF_N
differential pair XADC_DX: +XADC_DX_P -XADC_DX_N
differential pair HYPR_2: +HYPR_2_P -HYPR_2_N
differential pair HYPR_1: +HYPR_1_P -HYPR_1_N

## Components (designator, comment, footprint, x,y, rotation, side; value= is the part's Value field where it differs from the comment)
C1 "100n" CAPC0402_M 2755.91,-3818.9 r90 top
C2 "100n" CAPC0402_M 2755.91,-3288.98 r90 top
C3 "100n" CAPC0402_M 2970.87,-3031.5 r180 top
C4 "100n" CAPC0402_M 2974.02,-3586.13 r180 top
C5 "18p" CAPC0402_M 2989.2,-2381.89 r90 top
C6 "18p" CAPC0402_M 2992.13,-2834.65 r270 top
C7 "100n" CAPC0402_M 3013.39,-3503.94 r0 top
C8 "100n" CAPC0402_M 3031.5,-4055.12 r0 top
C9 "100n" CAPC0402_M 3129.92,-1437.01 r180 top
C10 "100n" CAPC0402_M 3112.2,-2696.85 r270 top
C11 "100n" CAPC0402_M 3149.61,-2106.3 r0 top
C12 "1u" CAPC0603_M 3174.16,-3531.51 r270 top
C13 "100n" CAPC0402_M 3194.61,-3112.32 r180 top
C14 "2u2" CAPC0603_M 3331.64,-3385.84 r180 top
C15 "18p" CAPC0402_M 3349.38,-2381.89 r90 top
C16 "470n" CAPC0603_M 3470.2,-3425.2 r90 top
C17 "18p" CAPC0402_M 3464.57,-2806.8 r270 top
C18 "100n" CAPC0402_M 3584.65,-2716.54 r270 top
C19 "100n" CAPC0402_M 3678.86,-3366.14 r180 top
C20 "47uF" CAPC3225X20N 2703.67,-2198.15 r0 bottom
C21 "47uF" CAPC3225X20N 2344.61,-1929.13 r180 bottom
C22 "47uF" CAPC3225X20N 2165.65,-3385.83 r0 bottom
C23 "47uF" CAPC3225X20N 2147.76,-1929.13 r0 bottom
C24 "100n" CAPC0402_M 2182.82,-2201.41 r90 bottom
C25 "2u2" CAPC0603_M 2145.67,-2500 r180 bottom
C26 "2u2" CAPC0603_M 2078.67,-2860.2 r180 bottom
C27 "100n" CAPC0402_M 2068.68,-2172.34 r270 bottom
C28 "100n" CAPC0402_M 2067.74,-2788.38 r90 bottom
C29 "100n" CAPC0402_M 2049.33,-2618.11 r180 bottom
C30 "100n" CAPC0402_M 2009.85,-3277.96 r0 bottom
C31 "2u2" CAPC0603_M 1990.28,-2421.26 r180 bottom
C32 "47uF" CAPC3225X20N 1934.46,-1927 r0 bottom
C33 "100n" CAPC0402_M 1988.19,-2342.52 r180 bottom
C34 "47uF" CAPC3225X20N 1929.13,-3464.57 r0 bottom
C35 "100n" CAPC0402_M 1990.28,-2913.39 r90 bottom
C36 "100n" CAPC0402_M 1989.23,-2795.28 r90 bottom
C37 "2u2" CAPC0603_M 2047.24,-3188.98 r90 bottom
C38 "2u2" CAPC0603_M 1940.06,-2229.66 r270 bottom
C39 "100n" CAPC0402_M 1907.37,-2580.82 r0 bottom
C40 "100n" CAPC0402_M 1893.43,-2854.33 r0 bottom
C41 "100n" CAPC0402_M 1891.85,-2303.15 r0 bottom
C42 "2u2" CAPC0603_M 1899.52,-2696.85 r270 bottom
C43 "2u2" CAPC0603_M 1850.39,-2381.89 r0 bottom
C44 "100n" CAPC0402_M 1813.11,-2736.22 r0 bottom
C45 "100n" CAPC0402_M 1811.02,-3011.81 r180 bottom
C46 "100n" CAPC0402_M 1712.6,-3149.61 r90 bottom
C47 "2u2" CAPC0603_M 1754.06,-2232.28 r90 bottom
C48 "100n" CAPC0402_M 1754.06,-2480.31 r90 bottom
C49 "100n" CAPC0402_M 1749.55,-2351.99 r270 bottom
C50 "100n" CAPC0402_M 1712.6,-3031.5 r90 bottom
C51 "100n" CAPC0402_M 1700.38,-2881.3 r270 bottom
C52 "100n" CAPC0402_M 1673.23,-2086.61 r180 bottom
C53 "2u2" CAPC0603_M 1643.11,-2677.09 r180 bottom
C54 "100n" CAPC0402_M 1653.54,-3464.57 r0 bottom
C55 "2u2" CAPC0603_M 1635.95,-3169.29 r0 bottom
C56 "100n" CAPC0402_M 1654.21,-3289.65 r0 bottom
C57 "100n" CAPC0402_M 1635.95,-2814.96 r270 bottom
C58 "2u2" CAPC0603_M 1596.58,-2460.63 r180 bottom
C59 "100n" CAPC0402_M 1576.89,-3248.03 r180 bottom
C60 "2u2" CAPC0603_M 1559.53,-2763.79 r180 bottom
C61 "2u2" CAPC0603_M 1557.21,-3090.55 r270 bottom
C62 "100n" CAPC0402_M 1545.09,-2140.03 r180 bottom
C63 "100n" CAPC0402_M 1516.32,-2997.78 r270 bottom
C64 "100n" CAPC0402_M 1491.81,-3249.11 r180 bottom
C65 "2u2" CAPC0603_M 1478.47,-2263.78 r0 bottom
C66 "2u2" CAPC0603_M 1358.27,-3051.18 r180 bottom
C67 "100n" CAPC0402_M 1478.47,-3117.13 r90 bottom
C68 "100n" CAPC0402_M 1465.92,-2396.71 r270 bottom
C69 "100n" CAPC0402_M 1439.1,-2992.13 r270 bottom
C70 "2u2" CAPC0603_M 1399.73,-3484.25 r180 bottom
C71 "100n" CAPC0402_M 1398.61,-3375.41 r270 bottom
C72 "47uF" CAPC3225X20N 1320.99,-1988.19 r180 bottom
C73 "100n" CAPC0402_M 1340.67,-2263.78 r180 bottom
C74 "2u2" CAPC0603_M 1320.99,-2362.2 r270 bottom
C75 "47uF" CAPC3225X20N 1251.05,-3430.81 r270 bottom
C76 "2u2" CAPC0603_M 1267.72,-2696.72 r0 bottom
C77 "2u2" CAPC0603_M 1222.56,-2460.63 r180 bottom
C78 "2u2" CAPC0603_M 1163.51,-2125.98 r90 bottom
C79 "100n" CAPC0402_M 1152.01,-2202.94 r180 bottom
C80 "47uF" CAPC3225X20N 1065.08,-1988.19 r180 bottom
C81 "100n" CAPC0402_M 1104.45,-2677.16 r270 bottom
C82 "100n" CAPC0402_M 1104.45,-2539.37 r270 bottom
C83 "47uF" CAPC3225X20N 1006.03,-3287.4 r270 bottom
C84 "47uF" CAPC3225X20N 1006.03,-2952.76 r90 bottom
C85 "47uF" CAPC3225X20N 969.51,-2672.8 r270 bottom
C86 "10u" CAPC0603_M 3768,-775 r90 top
C87 "1n" CAPC0603_M 3702,-776 r90 top
C88 "10u" CAPC0603_M 2741,-183 r270 top
C89 "100n" CAPC0402_M 4164,-976.89 r90 top
C90 "2u2" CAPC0603_M 4080,-1110 r90 top
C91 "2u2" CAPC0603_M 4069,-692.44 r90 top
C94 "DNM" CAPC0603_M 3930,-1228 r270 top
FAN1 "Blower Fan, 5V, 35x35mm" BFB03505HHA-A 1198.09,-4072.9 r270 top
HS1 "ATS-FPX035035015-56-C2-R0" ATS-FPX035035015-56-C2-R0 1791.34,-2775.59 r90 top locked
J1 "PCIe Edge Connect Gold Finder" PCIeX16-GF-2D-1000-1K-O164 -177.17,-1181.1 r270 top
J2 "87832-1420/XILINXJTAG" 87832-1420 3491.42,-4102.68 r270 top
J3 "5-1814832-1" SMA_VERT_1.65MMHOLE 3315.53,-914.45 r0 top
J4 "5-1814832-1" SMA_VERT_1.65MMHOLE 3310,-425 r0 top
J5 "Header 2" HDR1X2 3545.4,-648.03 r270 top
J6 "40-pin, 1.27mm" SHF-120-01-X-D-SM 2945,-4785 r270 top
J7 "5-1814832-1" SMA_VERT_1.65MMHOLE 3998,-400 r0 top
L1 "1.2uH, 21A" XAL7070-122 2757.99,-708.66 r90 top
L2 "FBMH3225HM102NTV" INDC3225X06N 3033.58,-708.66 r90 top value=1k@100MHz
L3 "120-Ohm/3A" IND_0603 3112.2,-2519.68 r90 top value=120R/3A
L4 "600-Ohm/0.5A" IND_0603 3489.88,-3326.77 r180 top value=600R/0.5A
L5 "120-Ohm/3A" IND_0603 3584.65,-2598.43 r90 top value=120R/3A
L6 "600-Ohm/0.5A" IND_0603 3678.86,-3307.09 r180 top value=600R/0.5A
L7 "LQH32DN150K53L" INDC3225X06N 2927,-179 r0 top value=1k@100MHz
L8 "LQH32DN150K53L" INDC3225X06N_LQH32 3910,-700 r180 top
L9 "5n1" IND_0603 3988,-1134 r0 top
MH1 "4-40 MH, Tight Fit" MOUNT_#4_TIGHT 2440.94,-196.85 r0 top
MH2 "4-40 MH, Tight Fit" MOUNT_#4_TIGHT 3661.42,-5314.96 r0 top
MH4 "4-40 MH, Tight Fit" MOUNT_#4_TIGHT 236.22,-5314.96 r0 top
MH6 "4-40 MH, Tight Fit" MOUNT_#4_TIGHT 236.22,-4330.71 r0 top
PWR1 "CW330VCCINT" CW335_VCCINT_POWERSUPPLY 178.93,-1377.21 r0 top
R1 "1k" RESC1005X40N 625.98,-3165.35 r180 top
R2 "DNM" RESC1005X40N 629.92,-3031.5 r180 top
R3 "1R0" RESC1005X40N 629.92,-3090.55 r180 top
R4 "DNM" RESC1005X40N 629.92,-2972.44 r0 top
R5 "1k" RESC1005X40N 775.59,-3090.55 r0 top
R6 "1k" RESC1005X40N 2777.56,-2618.11 r180 top
R7 "1k" RESC1005X40N 2777.56,-2559.06 r180 top
R8 "10k" RESC1005X40N 2834.65,-1318.9 r270 top
R9 "220k" RESC1005X40N 2874.02,-2381.89 r90 top
R10 "680k" RESC1005X40N 2874.02,-2834.65 r90 top
R11 "10k" RESC1005X40N 2893.7,-1318.9 r270 top
R12 "220k" RESC1005X40N 2933.07,-2834.65 r270 top
R13 "680k" RESC1005X40N 2933.07,-2381.89 r270 top
R14 "10k" RESC1005X40N 2972.44,-2204.72 r180 top
R15 "10k" RESC1005X40N 2952.76,-1318.9 r270 top
R16 "1k" RESC1005X40N 3264.07,-2637.8 r180 top
R17 "1k" RESC1005X40N 3264.07,-2559.06 r180 top
R18 "10k" RESC1005X40N 3307.09,-2204.72 r180 top
R19 "680k" RESC1005X40N 3346.46,-2806.8 r90 top
R20 "220k" RESC1005X40N 3405.51,-2806.8 r270 top
R21 "220k" RESC1005X40N 3405.51,-2381.89 r90 top
R22 "680k" RESC1005X40N 3484.25,-2381.89 r270 top
R23 "1k" RESC1005X40N 3548.17,-3584.66 r270 top
R24 "2k7" RESC1005X40N 3548.17,-3486.97 r270 top
R25 "1k5" RESC1608X55N 4164,-870.54 r90 top
R26 "51R" RESC1608X55N 3859,-1137 r0 top
SJ1 "NC" SJ_3S_NC12 700,-1985 r180 top
TP1 "PAD" 9022-0-00-15-00-00-33-0#1 2443.03,-1062.99 r0 top
TP2 "PAD" 9022-0-00-15-00-00-33-0#1 2443.03,-826.77 r0 top
TP3 "PAD" 9022-0-00-15-00-00-33-0#2 2443.03,118.11 r0 top
TP4 "5011" KEYSTONE5011 3584.77,-275.59 r0 top
TP5 "5008" KEYSTONE5008 3584.77,-944.88 r0 top
TP6 "5008" KEYSTONE5008 3584.77,-472.44 r0 top
U1 "XCKU095-3FFVA1156E" FP-XCKU060-3FFVA1156E-MFG 1791.34,-2775.59 r180 top locked
U2 "SRAM - 8Mb (1M x 8) Parallel  55ns 44-TSOP II" TSOP80P1180X120-44M 3129.92,-1751.97 r90 top
U3 "PSRAM 512MBIT HYPERBUS 24FBGA" BGA_24-TBGA_HYPERRAM 2952.76,-3818.9 r0 top
U4 "PSRAM 512MBIT HYPERBUS 24FBGA" BGA_24-TBGA_HYPERRAM 2952.76,-3267.72 r0 top
U5 "TLV8542DR" SOIC127P600X175-8N 2954.72,-2598.43 r270 top
U6 "REF3012AIDBZT" SOT95P237X112-3N 3226.11,-3232.4 r180 top
U7 "Linear Voltage Regulator IC  1 Output  300mA TSOT-5" SOT23-5P95_285X145L45X40 3331.64,-3523.63 r270 top
U8 "TLV8542DR" SOIC127P600X175-8N 3427.17,-2598.43 r270 top
U9 "PHA-13LN+" PHA13LN 4009.58,-913.94 r90 top

## Footprints (in the part's own frame and the unit in brackets; to place one, negate y for a bottom-side part, rotate by r counter-clockwise, add the part's x,y. Pads: shape width x height; smd on the part's side, far side on the other; paste and mask are expansions set on the pad)
9022-0-00-15-00-00-33-0#1 [mm]
  round 3.2 hole 1.68: 1(0,0)
9022-0-00-15-00-00-33-0#2 [mm]
  round 3.2 hole 1.68: 1(0,-17.5)
87832-1420 [mm] "87832-1420 (Molex)"
  rect 1x2.75 smd: 1(-6,-2.13) 2(-6,2.13) 3(-4,-2.13) 4(-4,2.13) 5(-2,-2.13) 6(-2,2.13) 7(0,-2.13) 8(0,2.13) 9(2,-2.13) 10(2,2.13) 11(4,-2.13) 12(4,2.13) 13(6,-2.13) 14(6,2.13)
  round 0 hole 1 unplated: MH1(-5,0) MH2(5,0)
  body extent -8.32,-3.15 8.33,3.15, height 7.58
ATS-FPX035035015-56-C2-R0 [mm]
  round 6 hole 3.175: 13(-20,20) 14(20,-20)
  body extent -23.99,-23.99 23.99,23.99, height 15.01
BFB03505HHA-A [mm]
  round 6 hole 3.2 unplated: MH1(0,0) MH2(30,0) MH3(30,30) MH4(0,30)
  silkscreen extent -2.5,-2.5 32.5,32.5, body extent -2.5,-2.5 32.5,32.5, height 10.01
BGA_24-TBGA_HYPERRAM [mm]
  round 0.35 smd paste+0 mask+0.07: A2(-1,2) A3(0,2) A4(1,2) A5(2,2) B1(-2,1) B2(-1,1) B3(0,1) B4(1,1) B5(2,1) C1(-2,0) C2(-1,0) C3(0,0) C4(1,0) C5(2,0) D1(-2,-1) D2(-1,-1) D3(0,-1) D4(1,-1) D5(2,-1) E1(-2,-2) E2(-1,-2) E3(0,-2) E4(1,-2) E5(2,-2)
  silkscreen extent -4,-5 4,5, body extent -3.02,-4.04 3,4, height 1
CAPC0402_M [mm] "Chip Capacitor, 2-Leads, Body 0402, IPC Medium Density"
  rect 0.64x0.64 smd mask+0.06: 1(-0.46,0) 2(0.46,0)
  silkscreen extent -0.97,-0.51 0.97,0.51, body extent -0.55,-0.3 0.55,0.3, height 0.6
CAPC0603_M [mm]
  rect 0.75x0.95 smd: 1(-0.7,0) 2(0.7,0)
  silkscreen extent -1.3,-0.7 1.3,0.7, body extent -0.85,-0.45 0.85,0.45, height 0.9
CAPC3225X20N [mm] "Chip Capacitor, 2-Leads, Body 3.18x2.53mm, IPC Medium Density"
  rect 1.3x2.7 smd: 1(-1.4,0) 2(1.4,0)
  silkscreen extent -2.35,-1.65 2.34,1.65, body extent -1.68,-1.33 1.68,1.33, height 2
CW335_VCCINT_POWERSUPPLY [mil]
  round 70 hole 40: 1(83,1178) 2(83,1078) 3(83,978) 7(83,378) 8(83,278) 9(83,178) 10(83,78) 14(683,78) 15(783,78) 16(883,78) 23(1783,78) 24(1883,78) 25(1983,78)
  rect 70x70 hole 40: 4(83,778) 5(83,678) 6(83,578) 11(283,78) 12(383,78) 13(483,78) 17(1083,78) 18(1183,78) 19(1283,78) 20(1383,78) 21(1483,78) 22(1583,78)
  Top Layer region: 844.5,-45 921,-45 921,78 844.5,78
  Top Layer region: 744.5,-45 821,-45 821,78 744.5,78
  Top Layer region: 644.5,-45 721,-45 721,78 644.5,78
  Top Layer region: -40,1216.5 -40,1140 83,1140 83,1216.5
  Top Layer region: -40,1116.5 -40,1040 83,1040 83,1116.5
  Top Layer region: -40,1016.5 -40,940 83,940 83,1016.5
  Top Layer region: 1844.5,-45 1921,-45 1921,78 1844.5,78
  Top Layer region: 1944.5,-45 2021,-45 2021,78 1944.5,78
  Top Layer region: 1744.5,-45 1821,-45 1821,78 1744.5,78
  Top Layer region: -40,216.5 -40,140 83,140 83,216.5
  Top Layer region: 3,413 3,343 83,343 83,413
  Top Layer region: -40,416.5 -40,340 83,340 83,416.5
  Top Layer region: -40,116.5 -40,40 83,40 83,116.5
  Top Layer region: 345.7,-47.47 422.2,-47.47 422.2,75.53 345.7,75.53
  Top Layer region: 244.5,-45 321,-45 321,78 244.5,78
  Top Layer region: 444.5,-45 521,-45 521,78 444.5,78
  Top Layer region: -40,616.5 -40,540 83,540 83,616.5
  Top Layer region: -40,716.5 -40,640 83,640 83,716.5
  Top Layer region: -40,816.5 -40,740 83,740 83,816.5
  Top Layer region: 1144.5,-45 1221,-45 1221,78 1144.5,78
  Top Layer region: 1044.5,-45 1121,-45 1121,78 1044.5,78
  Top Layer region: 1244.5,-45 1321,-45 1321,78 1244.5,78
  Top Layer region: 1444.5,-45 1521,-45 1521,78 1444.5,78
  Top Layer region: 1344.5,-45 1421,-45 1421,78 1344.5,78
  Top Layer region: 1544.5,-45 1621,-45 1621,78 1544.5,78
  Top Layer region: -40,316.5 -40,240 83,240 83,316.5
  silkscreen extent 3,-2 2123,1328
FP-XCKU060-3FFVA1156E-MFG [mm]
  round 0.53 smd paste+0 mask+0.025: A1(-16.5,16.5) A2(-15.5,16.5) A3(-14.5,16.5) A4(-13.5,16.5) A5(-12.5,16.5) A6(-11.5,16.5) A7(-10.5,16.5) A8(-9.5,16.5) A9(-8.5,16.5) A10(-7.5,16.5) A11(-6.5,16.5) A12(-5.5,16.5) A13(-4.5,16.5) A14(-3.5,16.5) A15(-2.5,16.5) A16(-1.5,16.5) A17(-0.5,16.5) A18(0.5,16.5) A19(1.5,16.5) A20(2.5,16.5) A21(3.5,16.5) A22(4.5,16.5) A23(5.5,16.5) A24(6.5,16.5) A25(7.5,16.5) A26(8.5,16.5) A27(9.5,16.5) A28(10.5,16.5) A29(11.5,16.5) A30(12.5,16.5) A31(13.5,16.5) A32(14.5,16.5) A33(15.5,16.5) A34(16.5,16.5) AA1(-16.5,-3.5) AA2(-15.5,-3.5) AA3(-14.5,-3.5) AA4(-13.5,-3.5) AA5(-12.5,-3.5) AA6(-11.5,-3.5) AA7(-10.5,-3.5) AA8(-9.5,-3.5) AA9(-8.5,-3.5) AA10(-7.5,-3.5) AA11(-6.5,-3.5) AA12(-5.5,-3.5) AA13(-4.5,-3.5) AA14(-3.5,-3.5) AA15(-2.5,-3.5) AA16(-1.5,-3.5) AA17(-0.5,-3.5) AA18(0.5,-3.5) AA19(1.5,-3.5) AA20(2.5,-3.5) AA21(3.5,-3.5) AA22(4.5,-3.5) AA23(5.5,-3.5) AA24(6.5,-3.5) AA25(7.5,-3.5) AA26(8.5,-3.5) AA27(9.5,-3.5) AA28(10.5,-3.5) AA29(11.5,-3.5) AA30(12.5,-3.5) AA31(13.5,-3.5) AA32(14.5,-3.5) AA33(15.5,-3.5) AA34(16.5,-3.5) AB1(-16.5,-4.5) AB2(-15.5,-4.5) AB3(-14.5,-4.5) AB4(-13.5,-4.5) AB5(-12.5,-4.5) AB6(-11.5,-4.5) AB7(-10.5,-4.5) AB8(-9.5,-4.5) AB9(-8.5,-4.5) AB10(-7.5,-4.5) AB11(-6.5,-4.5) AB12(-5.5,-4.5) AB13(-4.5,-4.5) AB14(-3.5,-4.5) AB15(-2.5,-4.5) AB16(-1.5,-4.5) AB17(-0.5,-4.5) AB18(0.5,-4.5) AB19(1.5,-4.5) AB20(2.5,-4.5) AB21(3.5,-4.5) AB22(4.5,-4.5) AB23(5.5,-4.5) AB24(6.5,-4.5) AB25(7.5,-4.5) AB26(8.5,-4.5) AB27(9.5,-4.5) AB28(10.5,-4.5) AB29(11.5,-4.5) AB30(12.5,-4.5) AB31(13.5,-4.5) AB32(14.5,-4.5) AB33(15.5,-4.5) AB34(16.5,-4.5) AC1(-16.5,-5.5) AC2(-15.5,-5.5) AC3(-14.5,-5.5) AC4(-13.5,-5.5) AC5(-12.5,-5.5) AC6(-11.5,-5.5) AC7(-10.5,-5.5) AC8(-9.5,-5.5) AC9(-8.5,-5.5) AC10(-7.5,-5.5) AC11(-6.5,-5.5) AC12(-5.5,-5.5) AC13(-4.5,-5.5) AC14(-3.5,-5.5) AC15(-2.5,-5.5) AC16(-1.5,-5.5) AC17(-0.5,-5.5) AC18(0.5,-5.5) AC19(1.5,-5.5) AC20(2.5,-5.5) AC21(3.5,-5.5) AC22(4.5,-5.5) AC23(5.5,-5.5) AC24(6.5,-5.5) AC25(7.5,-5.5) AC26(8.5,-5.5) AC27(9.5,-5.5) AC28(10.5,-5.5) AC29(11.5,-5.5) AC30(12.5,-5.5) AC31(13.5,-5.5) AC32(14.5,-5.5) AC33(15.5,-5.5) AC34(16.5,-5.5) AD1(-16.5,-6.5) AD2(-15.5,-6.5) AD3(-14.5,-6.5) AD4(-13.5,-6.5) AD5(-12.5,-6.5) AD6(-11.5,-6.5) AD7(-10.5,-6.5) AD8(-9.5,-6.5) AD9(-8.5,-6.5) AD10(-7.5,-6.5) AD11(-6.5,-6.5) AD12(-5.5,-6.5) AD13(-4.5,-6.5) AD14(-3.5,-6.5) AD15(-2.5,-6.5) AD16(-1.5,-6.5) AD17(-0.5,-6.5) AD18(0.5,-6.5) AD19(1.5,-6.5) AD20(2.5,-6.5) AD21(3.5,-6.5) AD22(4.5,-6.5) AD23(5.5,-6.5) AD24(6.5,-6.5) AD25(7.5,-6.5) AD26(8.5,-6.5) AD27(9.5,-6.5) AD28(10.5,-6.5) AD29(11.5,-6.5) AD30(12.5,-6.5) AD31(13.5,-6.5) AD32(14.5,-6.5) AD33(15.5,-6.5) AD34(16.5,-6.5) AE1(-16.5,-7.5) AE2(-15.5,-7.5) AE3(-14.5,-7.5) AE4(-13.5,-7.5) AE5(-12.5,-7.5) AE6(-11.5,-7.5) AE7(-10.5,-7.5) AE8(-9.5,-7.5) AE9(-8.5,-7.5) AE10(-7.5,-7.5) AE11(-6.5,-7.5) AE12(-5.5,-7.5) AE13(-4.5,-7.5) AE14(-3.5,-7.5) AE15(-2.5,-7.5) AE16(-1.5,-7.5) AE17(-0.5,-7.5) AE18(0.5,-7.5) AE19(1.5,-7.5) AE20(2.5,-7.5) AE21(3.5,-7.5) AE22(4.5,-7.5) AE23(5.5,-7.5) AE24(6.5,-7.5) AE25(7.5,-7.5) AE26(8.5,-7.5) AE27(9.5,-7.5) AE28(10.5,-7.5) AE29(11.5,-7.5) AE30(12.5,-7.5) AE31(13.5,-7.5) AE32(14.5,-7.5) AE33(15.5,-7.5) AE34(16.5,-7.5) AF1(-16.5,-8.5) AF2(-15.5,-8.5) AF3(-14.5,-8.5) AF4(-13.5,-8.5) AF5(-12.5,-8.5) AF6(-11.5,-8.5) AF7(-10.5,-8.5) AF8(-9.5,-8.5) AF9(-8.5,-8.5) AF10(-7.5,-8.5) AF11(-6.5,-8.5) AF12(-5.5,-8.5) AF13(-4.5,-8.5) AF14(-3.5,-8.5) AF15(-2.5,-8.5) AF16(-1.5,-8.5) AF17(-0.5,-8.5) AF18(0.5,-8.5) AF19(1.5,-8.5) AF20(2.5,-8.5) AF21(3.5,-8.5) AF22(4.5,-8.5) AF23(5.5,-8.5) AF24(6.5,-8.5) AF25(7.5,-8.5) AF26(8.5,-8.5) AF27(9.5,-8.5) AF28(10.5,-8.5) AF29(11.5,-8.5) AF30(12.5,-8.5) AF31(13.5,-8.5) AF32(14.5,-8.5) AF33(15.5,-8.5) AF34(16.5,-8.5) AG1(-16.5,-9.5) AG2(-15.5,-9.5) AG3(-14.5,-9.5) AG4(-13.5,-9.5) AG5(-12.5,-9.5) AG6(-11.5,-9.5) AG7(-10.5,-9.5) AG8(-9.5,-9.5) AG9(-8.5,-9.5) AG10(-7.5,-9.5) AG11(-6.5,-9.5) AG12(-5.5,-9.5) AG13(-4.5,-9.5) AG14(-3.5,-9.5) AG15(-2.5,-9.5) AG16(-1.5,-9.5) AG17(-0.5,-9.5) AG18(0.5,-9.5) AG19(1.5,-9.5) AG20(2.5,-9.5) AG21(3.5,-9.5) AG22(4.5,-9.5) AG23(5.5,-9.5) AG24(6.5,-9.5) AG25(7.5,-9.5) AG26(8.5,-9.5) AG27(9.5,-9.5) AG28(10.5,-9.5) AG29(11.5,-9.5) AG30(12.5,-9.5) AG31(13.5,-9.5) AG32(14.5,-9.5) AG33(15.5,-9.5) AG34(16.5,-9.5) AH1(-16.5,-10.5) AH2(-15.5,-10.5) AH3(-14.5,-10.5) AH4(-13.5,-10.5) AH5(-12.5,-10.5) AH6(-11.5,-10.5) AH7(-10.5,-10.5) AH8(-9.5,-10.5) AH9(-8.5,-10.5) AH10(-7.5,-10.5) AH11(-6.5,-10.5) AH12(-5.5,-10.5) AH13(-4.5,-10.5) AH14(-3.5,-10.5) AH15(-2.5,-10.5) AH16(-1.5,-10.5) AH17(-0.5,-10.5) AH18(0.5,-10.5) AH19(1.5,-10.5) AH20(2.5,-10.5) AH21(3.5,-10.5) AH22(4.5,-10.5) AH23(5.5,-10.5) AH24(6.5,-10.5) AH25(7.5,-10.5) AH26(8.5,-10.5) AH27(9.5,-10.5) AH28(10.5,-10.5) AH29(11.5,-10.5) AH30(12.5,-10.5) AH31(13.5,-10.5) AH32(14.5,-10.5) AH33(15.5,-10.5) AH34(16.5,-10.5) AJ1(-16.5,-11.5) AJ2(-15.5,-11.5) AJ3(-14.5,-11.5) AJ4(-13.5,-11.5) AJ5(-12.5,-11.5) AJ6(-11.5,-11.5) AJ7(-10.5,-11.5) AJ8(-9.5,-11.5) AJ9(-8.5,-11.5) AJ10(-7.5,-11.5) AJ11(-6.5,-11.5) AJ12(-5.5,-11.5) AJ13(-4.5,-11.5) AJ14(-3.5,-11.5) AJ15(-2.5,-11.5) AJ16(-1.5,-11.5) AJ17(-0.5,-11.5) AJ18(0.5,-11.5) AJ19(1.5,-11.5) AJ20(2.5,-11.5) AJ21(3.5,-11.5) AJ22(4.5,-11.5) AJ23(5.5,-11.5) AJ24(6.5,-11.5) AJ25(7.5,-11.5) AJ26(8.5,-11.5) AJ27(9.5,-11.5) AJ28(10.5,-11.5) AJ29(11.5,-11.5) AJ30(12.5,-11.5) AJ31(13.5,-11.5) AJ32(14.5,-11.5) AJ33(15.5,-11.5) AJ34(16.5,-11.5) AK1(-16.5,-12.5) AK2(-15.5,-12.5) AK3(-14.5,-12.5) AK4(-13.5,-12.5) AK5(-12.5,-12.5) AK6(-11.5,-12.5) AK7(-10.5,-12.5) AK8(-9.5,-12.5) AK9(-8.5,-12.5) AK10(-7.5,-12.5) AK11(-6.5,-12.5) AK12(-5.5,-12.5) AK13(-4.5,-12.5) AK14(-3.5,-12.5) AK15(-2.5,-12.5) AK16(-1.5,-12.5) AK17(-0.5,-12.5) AK18(0.5,-12.5) AK19(1.5,-12.5) AK20(2.5,-12.5) AK21(3.5,-12.5) AK22(4.5,-12.5) AK23(5.5,-12.5) AK24(6.5,-12.5) AK25(7.5,-12.5) AK26(8.5,-12.5) AK27(9.5,-12.5) AK28(10.5,-12.5) AK29(11.5,-12.5) AK30(12.5,-12.5) AK31(13.5,-12.5) AK32(14.5,-12.5) AK33(15.5,-12.5) AK34(16.5,-12.5) AL1(-16.5,-13.5) AL2(-15.5,-13.5) AL3(-14.5,-13.5) AL4(-13.5,-13.5) AL5(-12.5,-13.5) AL6(-11.5,-13.5) AL7(-10.5,-13.5) AL8(-9.5,-13.5) AL9(-8.5,-13.5) AL10(-7.5,-13.5) AL11(-6.5,-13.5) AL12(-5.5,-13.5) AL13(-4.5,-13.5) AL14(-3.5,-13.5) AL15(-2.5,-13.5) AL16(-1.5,-13.5) AL17(-0.5,-13.5) AL18(0.5,-13.5) AL19(1.5,-13.5) AL20(2.5,-13.5) AL21(3.5,-13.5) AL22(4.5,-13.5) AL23(5.5,-13.5) AL24(6.5,-13.5) AL25(7.5,-13.5) AL26(8.5,-13.5) AL27(9.5,-13.5) AL28(10.5,-13.5) AL29(11.5,-13.5) AL30(12.5,-13.5) AL31(13.5,-13.5) AL32(14.5,-13.5) AL33(15.5,-13.5) AL34(16.5,-13.5) AM1(-16.5,-14.5) AM2(-15.5,-14.5) AM3(-14.5,-14.5) AM4(-13.5,-14.5) AM5(-12.5,-14.5) AM6(-11.5,-14.5) AM7(-10.5,-14.5) AM8(-9.5,-14.5) AM9(-8.5,-14.5) AM10(-7.5,-14.5) AM11(-6.5,-14.5) AM12(-5.5,-14.5) AM13(-4.5,-14.5) AM14(-3.5,-14.5) AM15(-2.5,-14.5) AM16(-1.5,-14.5) AM17(-0.5,-14.5) AM18(0.5,-14.5) AM19(1.5,-14.5) AM20(2.5,-14.5) AM21(3.5,-14.5) AM22(4.5,-14.5) AM23(5.5,-14.5) AM24(6.5,-14.5) AM25(7.5,-14.5) AM26(8.5,-14.5) AM27(9.5,-14.5) AM28(10.5,-14.5) AM29(11.5,-14.5) AM30(12.5,-14.5) AM31(13.5,-14.5) AM32(14.5,-14.5) AM33(15.5,-14.5) AM34(16.5,-14.5) AN1(-16.5,-15.5) AN2(-15.5,-15.5) AN3(-14.5,-15.5) AN4(-13.5,-15.5) AN5(-12.5,-15.5) AN6(-11.5,-15.5) AN7(-10.5,-15.5) AN8(-9.5,-15.5) AN9(-8.5,-15.5) AN10(-7.5,-15.5) AN11(-6.5,-15.5) AN12(-5.5,-15.5) AN13(-4.5,-15.5) AN14(-3.5,-15.5) AN15(-2.5,-15.5) AN16(-1.5,-15.5) AN17(-0.5,-15.5) AN18(0.5,-15.5) AN19(1.5,-15.5) AN20(2.5,-15.5) AN21(3.5,-15.5) AN22(4.5,-15.5) AN23(5.5,-15.5) AN24(6.5,-15.5) AN25(7.5,-15.5) AN26(8.5,-15.5) AN27(9.5,-15.5) AN28(10.5,-15.5) AN29(11.5,-15.5) AN30(12.5,-15.5) AN31(13.5,-15.5) AN32(14.5,-15.5) AN33(15.5,-15.5) AN34(16.5,-15.5) AP1(-16.5,-16.5) AP2(-15.5,-16.5) AP3(-14.5,-16.5) AP4(-13.5,-16.5) AP5(-12.5,-16.5) AP6(-11.5,-16.5) AP7(-10.5,-16.5) AP8(-9.5,-16.5) AP9(-8.5,-16.5) AP10(-7.5,-16.5) AP11(-6.5,-16.5) AP12(-5.5,-16.5) AP13(-4.5,-16.5) AP14(-3.5,-16.5) AP15(-2.5,-16.5) AP16(-1.5,-16.5) AP17(-0.5,-16.5) AP18(0.5,-16.5) AP19(1.5,-16.5) AP20(2.5,-16.5) AP21(3.5,-16.5) AP22(4.5,-16.5) AP23(5.5,-16.5) AP24(6.5,-16.5) AP25(7.5,-16.5) AP26(8.5,-16.5) AP27(9.5,-16.5) AP28(10.5,-16.5) AP29(11.5,-16.5) AP30(12.5,-16.5) AP31(13.5,-16.5) AP32(14.5,-16.5) AP33(15.5,-16.5) AP34(16.5,-16.5) B1(-16.5,15.5) B2(-15.5,15.5) B3(-14.5,15.5) B4(-13.5,15.5) B5(-12.5,15.5) B6(-11.5,15.5) B7(-10.5,15.5) B8(-9.5,15.5) B9(-8.5,15.5) B10(-7.5,15.5) B11(-6.5,15.5) B12(-5.5,15.5) B13(-4.5,15.5) B14(-3.5,15.5) B15(-2.5,15.5) B16(-1.5,15.5) B17(-0.5,15.5) B18(0.5,15.5) B19(1.5,15.5) B20(2.5,15.5) B21(3.5,15.5) B22(4.5,15.5) B23(5.5,15.5) B24(6.5,15.5) B25(7.5,15.5) B26(8.5,15.5) B27(9.5,15.5) B28(10.5,15.5) B29(11.5,15.5) B30(12.5,15.5) B31(13.5,15.5) B32(14.5,15.5) B33(15.5,15.5) B34(16.5,15.5) C1(-16.5,14.5) C2(-15.5,14.5) C3(-14.5,14.5) C4(-13.5,14.5) C5(-12.5,14.5) C6(-11.5,14.5) C7(-10.5,14.5) C8(-9.5,14.5) C9(-8.5,14.5) C10(-7.5,14.5) C11(-6.5,14.5) C12(-5.5,14.5) C13(-4.5,14.5) C14(-3.5,14.5) C15(-2.5,14.5) C16(-1.5,14.5) C17(-0.5,14.5) C18(0.5,14.5) C19(1.5,14.5) C20(2.5,14.5) C21(3.5,14.5) C22(4.5,14.5) C23(5.5,14.5) C24(6.5,14.5) C25(7.5,14.5) C26(8.5,14.5) C27(9.5,14.5) C28(10.5,14.5) C29(11.5,14.5) C30(12.5,14.5) C31(13.5,14.5) C32(14.5,14.5) C33(15.5,14.5) C34(16.5,14.5) D1(-16.5,13.5) D2(-15.5,13.5) D3(-14.5,13.5) D4(-13.5,13.5) D5(-12.5,13.5) D6(-11.5,13.5) D7(-10.5,13.5) D8(-9.5,13.5) D9(-8.5,13.5) D10(-7.5,13.5) D11(-6.5,13.5) D12(-5.5,13.5) D13(-4.5,13.5) D14(-3.5,13.5) D15(-2.5,13.5) D16(-1.5,13.5) D17(-0.5,13.5) D18(0.5,13.5) D19(1.5,13.5) D20(2.5,13.5) D21(3.5,13.5) D22(4.5,13.5) D23(5.5,13.5) D24(6.5,13.5) D25(7.5,13.5) D26(8.5,13.5) D27(9.5,13.5) D28(10.5,13.5) D29(11.5,13.5) D30(12.5,13.5) D31(13.5,13.5) D32(14.5,13.5) D33(15.5,13.5) D34(16.5,13.5) E1(-16.5,12.5) E2(-15.5,12.5) E3(-14.5,12.5) E4(-13.5,12.5) E5(-12.5,12.5) E6(-11.5,12.5) E7(-10.5,12.5) E8(-9.5,12.5) E9(-8.5,12.5) E10(-7.5,12.5) E11(-6.5,12.5) E12(-5.5,12.5) E13(-4.5,12.5) E14(-3.5,12.5) E15(-2.5,12.5) E16(-1.5,12.5) E17(-0.5,12.5) E18(0.5,12.5) E19(1.5,12.5) E20(2.5,12.5) E21(3.5,12.5) E22(4.5,12.5) E23(5.5,12.5) E24(6.5,12.5) E25(7.5,12.5) E26(8.5,12.5) E27(9.5,12.5) E28(10.5,12.5) E29(11.5,12.5) E30(12.5,12.5) E31(13.5,12.5) E32(14.5,12.5) E33(15.5,12.5) E34(16.5,12.5) F1(-16.5,11.5) F2(-15.5,11.5) F3(-14.5,11.5) F4(-13.5,11.5) F5(-12.5,11.5) F6(-11.5,11.5) F7(-10.5,11.5) F8(-9.5,11.5) F9(-8.5,11.5) F10(-7.5,11.5) F11(-6.5,11.5) F12(-5.5,11.5) F13(-4.5,11.5) F14(-3.5,11.5) F15(-2.5,11.5) F16(-1.5,11.5) F17(-0.5,11.5) F18(0.5,11.5) F19(1.5,11.5) F20(2.5,11.5) F21(3.5,11.5) F22(4.5,11.5) F23(5.5,11.5) F24(6.5,11.5) F25(7.5,11.5) F26(8.5,11.5) F27(9.5,11.5) F28(10.5,11.5) F29(11.5,11.5) F30(12.5,11.5) F31(13.5,11.5) F32(14.5,11.5) F33(15.5,11.5) F34(16.5,11.5) G1(-16.5,10.5) G2(-15.5,10.5) G3(-14.5,10.5) G4(-13.5,10.5) G5(-12.5,10.5) G6(-11.5,10.5) G7(-10.5,10.5) G8(-9.5,10.5) G9(-8.5,10.5) G10(-7.5,10.5) G11(-6.5,10.5) G12(-5.5,10.5) G13(-4.5,10.5) G14(-3.5,10.5) G15(-2.5,10.5) G16(-1.5,10.5) G17(-0.5,10.5) G18(0.5,10.5) G19(1.5,10.5) G20(2.5,10.5) G21(3.5,10.5) G22(4.5,10.5) G23(5.5,10.5) G24(6.5,10.5) G25(7.5,10.5) G26(8.5,10.5) G27(9.5,10.5) G28(10.5,10.5) G29(11.5,10.5) G30(12.5,10.5) G31(13.5,10.5) G32(14.5,10.5) G33(15.5,10.5) G34(16.5,10.5) H1(-16.5,9.5) H2(-15.5,9.5) H3(-14.5,9.5) H4(-13.5,9.5) H5(-12.5,9.5) H6(-11.5,9.5) H7(-10.5,9.5) H8(-9.5,9.5) H9(-8.5,9.5) H10(-7.5,9.5) H11(-6.5,9.5) H12(-5.5,9.5) H13(-4.5,9.5) H14(-3.5,9.5) H15(-2.5,9.5) H16(-1.5,9.5) H17(-0.5,9.5) H18(0.5,9.5) H19(1.5,9.5) H20(2.5,9.5) H21(3.5,9.5) H22(4.5,9.5) H23(5.5,9.5) H24(6.5,9.5) H25(7.5,9.5) H26(8.5,9.5) H27(9.5,9.5) H28(10.5,9.5) H29(11.5,9.5) H30(12.5,9.5) H31(13.5,9.5) H32(14.5,9.5) H33(15.5,9.5) H34(16.5,9.5) J1(-16.5,8.5) J2(-15.5,8.5) J3(-14.5,8.5) J4(-13.5,8.5) J5(-12.5,8.5) J6(-11.5,8.5) J7(-10.5,8.5) J8(-9.5,8.5) J9(-8.5,8.5) J10(-7.5,8.5) J11(-6.5,8.5) J12(-5.5,8.5) J13(-4.5,8.5) J14(-3.5,8.5) J15(-2.5,8.5) J16(-1.5,8.5) J17(-0.5,8.5) J18(0.5,8.5) J19(1.5,8.5) J20(2.5,8.5) J21(3.5,8.5) J22(4.5,8.5) J23(5.5,8.5) J24(6.5,8.5) J25(7.5,8.5) J26(8.5,8.5) J27(9.5,8.5) J28(10.5,8.5) J29(11.5,8.5) J30(12.5,8.5) J31(13.5,8.5) J32(14.5,8.5) J33(15.5,8.5) J34(16.5,8.5) K1(-16.5,7.5) K2(-15.5,7.5) K3(-14.5,7.5) K4(-13.5,7.5) K5(-12.5,7.5) K6(-11.5,7.5) K7(-10.5,7.5) K8(-9.5,7.5) K9(-8.5,7.5) K10(-7.5,7.5) K11(-6.5,7.5) K12(-5.5,7.5) K13(-4.5,7.5) K14(-3.5,7.5) K15(-2.5,7.5) K16(-1.5,7.5) K17(-0.5,7.5) K18(0.5,7.5) K19(1.5,7.5) K20(2.5,7.5) K21(3.5,7.5) K22(4.5,7.5) K23(5.5,7.5) K24(6.5,7.5) K25(7.5,7.5) K26(8.5,7.5) K27(9.5,7.5) K28(10.5,7.5) K29(11.5,7.5) K30(12.5,7.5) K31(13.5,7.5) K32(14.5,7.5) K33(15.5,7.5) K34(16.5,7.5) L1(-16.5,6.5) L2(-15.5,6.5) L3(-14.5,6.5) L4(-13.5,6.5) L5(-12.5,6.5) L6(-11.5,6.5) L7(-10.5,6.5) L8(-9.5,6.5) L9(-8.5,6.5) L10(-7.5,6.5) L11(-6.5,6.5) L12(-5.5,6.5) L13(-4.5,6.5) L14(-3.5,6.5) L15(-2.5,6.5) L16(-1.5,6.5) L17(-0.5,6.5) L18(0.5,6.5) L19(1.5,6.5) L20(2.5,6.5) L21(3.5,6.5) L22(4.5,6.5) L23(5.5,6.5) L24(6.5,6.5) L25(7.5,6.5) L26(8.5,6.5) L27(9.5,6.5) L28(10.5,6.5) L29(11.5,6.5) L30(12.5,6.5) L31(13.5,6.5) L32(14.5,6.5) L33(15.5,6.5) L34(16.5,6.5) M1(-16.5,5.5) M2(-15.5,5.5) M3(-14.5,5.5) M4(-13.5,5.5) M5(-12.5,5.5) M6(-11.5,5.5) M7(-10.5,5.5) M8(-9.5,5.5) M9(-8.5,5.5) M10(-7.5,5.5) M11(-6.5,5.5) M12(-5.5,5.5) M13(-4.5,5.5) M14(-3.5,5.5) M15(-2.5,5.5) M16(-1.5,5.5) M17(-0.5,5.5) M18(0.5,5.5) M19(1.5,5.5) M20(2.5,5.5) M21(3.5,5.5) M22(4.5,5.5) M23(5.5,5.5) M24(6.5,5.5) M25(7.5,5.5) M26(8.5,5.5) M27(9.5,5.5) M28(10.5,5.5) M29(11.5,5.5) M30(12.5,5.5) M31(13.5,5.5) M32(14.5,5.5) M33(15.5,5.5) M34(16.5,5.5) N1(-16.5,4.5) N2(-15.5,4.5) N3(-14.5,4.5) N4(-13.5,4.5) N5(-12.5,4.5) N6(-11.5,4.5) N7(-10.5,4.5) N8(-9.5,4.5) N9(-8.5,4.5) N10(-7.5,4.5) N11(-6.5,4.5) N12(-5.5,4.5) N13(-4.5,4.5) N14(-3.5,4.5) N15(-2.5,4.5) N16(-1.5,4.5) N17(-0.5,4.5) N18(0.5,4.5) N19(1.5,4.5) N20(2.5,4.5) N21(3.5,4.5) N22(4.5,4.5) N23(5.5,4.5) N24(6.5,4.5) N25(7.5,4.5) N26(8.5,4.5) N27(9.5,4.5) N28(10.5,4.5) N29(11.5,4.5) N30(12.5,4.5) N31(13.5,4.5) N32(14.5,4.5) N33(15.5,4.5) N34(16.5,4.5) P1(-16.5,3.5) P2(-15.5,3.5) P3(-14.5,3.5) P4(-13.5,3.5) P5(-12.5,3.5) P6(-11.5,3.5) P7(-10.5,3.5) P8(-9.5,3.5) P9(-8.5,3.5) P10(-7.5,3.5) P11(-6.5,3.5) P12(-5.5,3.5) P13(-4.5,3.5) P14(-3.5,3.5) P15(-2.5,3.5) P16(-1.5,3.5) P17(-0.5,3.5) P18(0.5,3.5) P19(1.5,3.5) P20(2.5,3.5) P21(3.5,3.5) P22(4.5,3.5) P23(5.5,3.5) P24(6.5,3.5) P25(7.5,3.5) P26(8.5,3.5) P27(9.5,3.5) P28(10.5,3.5) P29(11.5,3.5) P30(12.5,3.5) P31(13.5,3.5) P32(14.5,3.5) P33(15.5,3.5) P34(16.5,3.5) R1(-16.5,2.5) R2(-15.5,2.5) R3(-14.5,2.5) R4(-13.5,2.5) R5(-12.5,2.5) R6(-11.5,2.5) R7(-10.5,2.5) R8(-9.5,2.5) R9(-8.5,2.5) R10(-7.5,2.5) R11(-6.5,2.5) R12(-5.5,2.5) R13(-4.5,2.5) R14(-3.5,2.5) R15(-2.5,2.5) R16(-1.5,2.5) R17(-0.5,2.5) R18(0.5,2.5) R19(1.5,2.5) R20(2.5,2.5) R21(3.5,2.5) R22(4.5,2.5) R23(5.5,2.5) R24(6.5,2.5) R25(7.5,2.5) R26(8.5,2.5) R27(9.5,2.5) R28(10.5,2.5) R29(11.5,2.5) R30(12.5,2.5) R31(13.5,2.5) R32(14.5,2.5) R33(15.5,2.5) R34(16.5,2.5) T1(-16.5,1.5) T2(-15.5,1.5) T3(-14.5,1.5) T4(-13.5,1.5) T5(-12.5,1.5) T6(-11.5,1.5) T7(-10.5,1.5) T8(-9.5,1.5) T9(-8.5,1.5) T10(-7.5,1.5) T11(-6.5,1.5) T12(-5.5,1.5) T13(-4.5,1.5) T14(-3.5,1.5) T15(-2.5,1.5) T16(-1.5,1.5) T17(-0.5,1.5) T18(0.5,1.5) T19(1.5,1.5) T20(2.5,1.5) T21(3.5,1.5) T22(4.5,1.5) T23(5.5,1.5) T24(6.5,1.5) T25(7.5,1.5) T26(8.5,1.5) T27(9.5,1.5) T28(10.5,1.5) T29(11.5,1.5) T30(12.5,1.5) T31(13.5,1.5) T32(14.5,1.5) T33(15.5,1.5) T34(16.5,1.5) U1(-16.5,0.5) U2(-15.5,0.5) U3(-14.5,0.5) U4(-13.5,0.5) U5(-12.5,0.5) U6(-11.5,0.5) U7(-10.5,0.5) U8(-9.5,0.5) U9(-8.5,0.5) U10(-7.5,0.5) U11(-6.5,0.5) U12(-5.5,0.5) U13(-4.5,0.5) U14(-3.5,0.5) U15(-2.5,0.5) U16(-1.5,0.5) U17(-0.5,0.5) U18(0.5,0.5) U19(1.5,0.5) U20(2.5,0.5) U21(3.5,0.5) U22(4.5,0.5) U23(5.5,0.5) U24(6.5,0.5) U25(7.5,0.5) U26(8.5,0.5) U27(9.5,0.5) U28(10.5,0.5) U29(11.5,0.5) U30(12.5,0.5) U31(13.5,0.5) U32(14.5,0.5) U33(15.5,0.5) U34(16.5,0.5) V1(-16.5,-0.5) V2(-15.5,-0.5) V3(-14.5,-0.5) V4(-13.5,-0.5) V5(-12.5,-0.5) V6(-11.5,-0.5) V7(-10.5,-0.5) V8(-9.5,-0.5) V9(-8.5,-0.5) V10(-7.5,-0.5) V11(-6.5,-0.5) V12(-5.5,-0.5) V13(-4.5,-0.5) V14(-3.5,-0.5) V15(-2.5,-0.5) V16(-1.5,-0.5) V17(-0.5,-0.5) V18(0.5,-0.5) V19(1.5,-0.5) V20(2.5,-0.5) V21(3.5,-0.5) V22(4.5,-0.5) V23(5.5,-0.5) V24(6.5,-0.5) V25(7.5,-0.5) V26(8.5,-0.5) V27(9.5,-0.5) V28(10.5,-0.5) V29(11.5,-0.5) V30(12.5,-0.5) V31(13.5,-0.5) V32(14.5,-0.5) V33(15.5,-0.5) V34(16.5,-0.5) W1(-16.5,-1.5) W2(-15.5,-1.5) W3(-14.5,-1.5) W4(-13.5,-1.5) W5(-12.5,-1.5) W6(-11.5,-1.5) W7(-10.5,-1.5) W8(-9.5,-1.5) W9(-8.5,-1.5) W10(-7.5,-1.5) W11(-6.5,-1.5) W12(-5.5,-1.5) W13(-4.5,-1.5) W14(-3.5,-1.5) W15(-2.5,-1.5) W16(-1.5,-1.5) W17(-0.5,-1.5) W18(0.5,-1.5) W19(1.5,-1.5) W20(2.5,-1.5) W21(3.5,-1.5) W22(4.5,-1.5) W23(5.5,-1.5) W24(6.5,-1.5) W25(7.5,-1.5) W26(8.5,-1.5) W27(9.5,-1.5) W28(10.5,-1.5) W29(11.5,-1.5) W30(12.5,-1.5) W31(13.5,-1.5) W32(14.5,-1.5) W33(15.5,-1.5) W34(16.5,-1.5) Y1(-16.5,-2.5) Y2(-15.5,-2.5) Y3(-14.5,-2.5) Y4(-13.5,-2.5) Y5(-12.5,-2.5) Y6(-11.5,-2.5) Y7(-10.5,-2.5) Y8(-9.5,-2.5) Y9(-8.5,-2.5) Y10(-7.5,-2.5) Y11(-6.5,-2.5) Y12(-5.5,-2.5) Y13(-4.5,-2.5) Y14(-3.5,-2.5) Y15(-2.5,-2.5) Y16(-1.5,-2.5) Y17(-0.5,-2.5) Y18(0.5,-2.5) Y19(1.5,-2.5) Y20(2.5,-2.5) Y21(3.5,-2.5) Y22(4.5,-2.5) Y23(5.5,-2.5) Y24(6.5,-2.5) Y25(7.5,-2.5) Y26(8.5,-2.5) Y27(9.5,-2.5) Y28(10.5,-2.5) Y29(11.5,-2.5) Y30(12.5,-2.5) Y31(13.5,-2.5) Y32(14.5,-2.5) Y33(15.5,-2.5) Y34(16.5,-2.5)
  silkscreen extent -18.55,-17.6 17.6,17.6, body extent -18.1,-18.1 18.1,18.1, height 0.25
HDR1X2 [mm] "Connector; Header; 2 Position"
  rect 1.5x1.5 hole 0.9: 1(0,0)
  round 1.5 hole 0.9: 2(2.54,0)
  silkscreen extent -1.27,-1.27 3.81,1.27
IND_0603 [mm] "Chip Inductor, 2-Leads, Body 1.60x0.80mm, IPC Medium Density"
  rect 0.64x0.92 smd: 1(-0.73,0) 2(0.73,0)
  Top Layer pour cut-out: -0.686,0.457 0.838,0.457 0.838,-0.457 -0.686,-0.457
  silkscreen extent -1.27,-0.64 1.27,0.64, body extent -0.82,-0.43 0.82,0.43, height 0.9
INDC3225X06N [mm] "Chip Inductor, 2-Leads, Body 3.20x2.50mm, IPC Medium Density"
  rect 1.4x2.9 smd: 1(-1.45,0) 2(1.45,0)
  silkscreen extent -2.4,-1.7 2.4,1.7, body extent -1.7,-1.35 1.7,1.35, height 2.5
INDC3225X06N_LQH32 [mm] "Chip Inductor, 2-Leads, Body 3.20x2.50mm, IPC Medium Density"
  rect 1.4x2.9 smd: 1(-1.45,0) 2(1.45,0)
  silkscreen extent -2.4,-1.7 2.4,1.7, body extent -1.6,-1.25 1.6,1.25, height 2.2
KEYSTONE5008 [mm] "TEST POINT PC MULTI PURPOSE ORG"
  round 3.1 hole 1.6: 1(0,0)
  body extent -1.59,-1.59 1.59,1.59, height 5.47
KEYSTONE5011 [mm] "TEST POINT PC MULTI PURPOSE BLK"
  round 3.1 hole 1.6: 1(0,0)
  body extent -1.59,-1.59 1.59,1.59, height 8.13
MOUNT_#4_TIGHT [mil]
  round 14 hole 12: 1(-82.21,0) 1(-58.13,-58.13) 1(-58.13,58.13) 1(0,-82.21) 1(0,82.21) 1(58.13,-58.13) 1(58.13,58.13) 1(82.21,0)
  round 208.66 hole 112.2: 1(0,0)
PCIeX16-GF-2D-1000-1K-O164 [mm] "Golden finger, PCIeX16, Dual, Opposite, Pitch 1mm, 164-Position"
  rect 0.7x4.2 smd far side paste-1: A1(-9.5,0) A2(-8.5,0) A3(-7.5,0) A4(-6.5,0) A5(-5.5,0) A6(-4.5,0) A7(-3.5,0) A8(-2.5,0) A9(-1.5,0) A10(-0.5,0) A11(0.5,0) A12(3.5,0) A13(4.5,0) A14(5.5,0) A15(6.5,0) A16(7.5,0) A17(8.5,0) A18(9.5,0) A19(10.5,0) A20(11.5,0) A21(12.5,0) A22(13.5,0) A23(14.5,0) A24(15.5,0) A25(16.5,0) A26(17.5,0) A27(18.5,0) A28(19.5,0) A29(20.5,0) A30(21.5,0) A31(22.5,0) A32(23.5,0) A33(24.5,0) A34(25.5,0) A35(26.5,0) A36(27.5,0) A37(28.5,0) A38(29.5,0) A39(30.5,0) A40(31.5,0) A41(32.5,0) A42(33.5,0) A43(34.5,0) A44(35.5,0) A45(36.5,0) A46(37.5,0) A47(38.5,0) A48(39.5,0) A49(40.5,0) A50(41.5,0) A51(42.5,0) A52(43.5,0) A53(44.5,0) A54(45.5,0) A55(46.5,0) A56(47.5,0) A57(48.5,0) A58(49.5,0) A59(50.5,0) A60(51.5,0) A61(52.5,0) A62(53.5,0) A63(54.5,0) A64(55.5,0) A65(56.5,0) A66(57.5,0) A67(58.5,0) A68(59.5,0) A69(60.5,0) A70(61.5,0) A71(62.5,0) A72(63.5,0) A73(64.5,0) A74(65.5,0) A75(66.5,0) A76(67.5,0) A77(68.5,0) A78(69.5,0) A79(70.5,0) A80(71.5,0) A81(72.5,0) A82(73.5,0)
  rect 0.7x4.2 smd paste-1: B1(-9.5,0) B2(-8.5,0) B3(-7.5,0) B4(-6.5,0) B5(-5.5,0) B6(-4.5,0) B7(-3.5,0) B8(-2.5,0) B9(-1.5,0) B10(-0.5,0) B11(0.5,0) B12(3.5,0) B13(4.5,0) B14(5.5,0) B15(6.5,0) B16(7.5,0) B17(8.5,0) B18(9.5,0) B19(10.5,0) B20(11.5,0) B21(12.5,0) B22(13.5,0) B23(14.5,0) B24(15.5,0) B25(16.5,0) B26(17.5,0) B27(18.5,0) B28(19.5,0) B29(20.5,0) B30(21.5,0) B31(22.5,0) B32(23.5,0) B33(24.5,0) B34(25.5,0) B35(26.5,0) B36(27.5,0) B37(28.5,0) B38(29.5,0) B39(30.5,0) B40(31.5,0) B41(32.5,0) B42(33.5,0) B43(34.5,0) B44(35.5,0) B45(36.5,0) B46(37.5,0) B47(38.5,0) B48(39.5,0) B49(40.5,0) B50(41.5,0) B51(42.5,0) B52(43.5,0) B53(44.5,0) B54(45.5,0) B55(46.5,0) B56(47.5,0) B57(48.5,0) B58(49.5,0) B59(50.5,0) B60(51.5,0) B61(52.5,0) B62(53.5,0) B63(54.5,0) B64(55.5,0) B65(56.5,0) B66(57.5,0) B67(58.5,0) B68(59.5,0) B69(60.5,0) B70(61.5,0) B71(62.5,0) B72(63.5,0) B73(64.5,0) B74(65.5,0) B75(66.5,0) B76(67.5,0) B77(68.5,0) B78(69.5,0) B79(70.5,0) B80(71.5,0) B81(72.5,0) B82(73.5,0)
PHA13LN [mm]
  rect 0.71x1.5 smd: 1(-1.5,-1.56) 3(1.5,-1.56)
  rect 0.91x2.5 smd: 2(0,-1.06)
  rect 1.91x2.92 smd: 4(0,1.56)
  silkscreen extent -2.45,-2 2.25,1.22, body extent -2.25,-1.22 2.25,1.22, height 1.7
RESC1005X40N [mm] "Chip Resistor, Body 1.0x0.5mm, EIA 0402, IPC Medium Density"
  round 0.2 on Mech15: 0(0,0)
  rrect20% 0.6x0.6 smd: 1(-0.5,0) 2(0.5,0)
  Top Layer pour cut-out: -0.325,0.375 -0.2,0.5 0.2,0.5 0.325,0.375 0.325,-0.375 0.2,-0.5 -0.2,-0.5 -0.325,-0.375
  silkscreen extent -1.05,-0.55 1.05,0.55, body extent -0.52,-0.27 0.53,0.28, height 0.4
RESC1608X55N [mm] "Chip Resistor, Body 1.6x0.8mm, EIA 0603, IPC Medium Density"
  round 0.254 on Mech15: 0(0,0)
  rrect25% 0.9x1 smd: 1(-0.85,0) 2(0.85,0)
  Top Layer pour cut-out: -0.6,0.5 0.6,0.5 0.6,-0.5 -0.6,-0.5
  silkscreen extent -1.5,-0.7 1.5,0.7, body extent -0.87,-0.47 0.88,0.48, height 0.54
SHF-120-01-X-D-SM [mil]
  rect 29x110 smd mask+2: 1(-475,-80) 2(-475,80) 3(-425,-80) 4(-425,80) 5(-375,-80) 6(-375,80) 7(-325,-80) 8(-325,80) 9(-275,-80) 10(-275,80) 11(-225,-80) 12(-225,80) 13(-175,-80) 14(-175,80) 15(-125,-80) 16(-125,80) 17(-75,-80) 18(-75,80) 19(-25,-80) 20(-25,80) 21(25,-80) 22(25,80) 23(75,-80) 24(75,80) 25(125,-80) 26(125,80) 27(175,-80) 28(175,80) 29(225,-80) 30(225,80) 31(275,-80) 32(275,80) 33(325,-80) 34(325,80) 35(375,-80) 36(375,80) 37(425,-80) 38(425,80) 39(475,-80) 40(475,80)
  silkscreen extent -645,-195 645,160, body extent -625,-120 625,120, height 210
SJ_3S_NC12 [mil] "3-Way Solder Jumper, pads 1-2 closed"
  rect 25x50 smd: 1(-32.43,0) 2(0,0)
  rect 25x50 smd paste-393.7: 3(32.44,0)
  silkscreen extent -60,-39 59,39
SMA_VERT_1.65MMHOLE [mm] "SMA Straight Jack, 6.35x6.35x9.5mm, Rosenberger Recommended"
  round 2.2 hole 1.65: 1(0,0) MH(-2.54,-2.54) MH(-2.54,2.54) MH(2.54,-2.54) MH(2.54,2.54)
  silkscreen extent -3.18,-3.18 3.18,3.17, body extent -3.17,-3.17 3.18,3.18, height 9.5
SOIC127P600X175-8N [mm] "SOIC, 8-Leads, Body 4.90x3.90mm, Pitch 1.27mm, IPC Medium Density"
  oval 1.65x0.6 smd: 1(-2.825,1.905) 2(-2.825,0.635) 3(-2.825,-0.635) 4(-2.825,-1.905) 5(2.825,-1.905) 6(2.825,-0.635) 7(2.825,0.635) 8(2.825,1.905)
  silkscreen extent -2.95,-2.5 1.6,2.88, body extent -3,-2.5 3,2.5, height 1.75
SOT23-5P95_285X145L45X40 [mm] "Small Outline Transistor (SOT23), 0.95 mm pitch; 5 pin, 3.00 mm L X 1.60 mm W X 1.45 mm H body"
  rrect50% 0.6x1.05 smd: 1(-0.95,-1.35) 2(0,-1.35) 3(0.95,-1.35) 4(0.95,1.35) 5(-0.95,1.35)
  silkscreen extent -1.55,-0.85 1.55,0.85, body extent -1.5,-1.43 1.5,1.43, height 1.45
SOT95P237X112-3N [mm] "SOT23, 3-Leads, Body 2.92x2.37mm, Pitch 0.95mm, IPC Medium Density"
  rect 1x0.6 smd: 1(-1.2,0.95) 2(-1.2,-0.95) 3(1.2,0)
  silkscreen extent -1.33,-1.5 0.7,1.92, body extent -1.32,-1.52 1.32,1.52, height 1.12
TSOP80P1180X120-44M [mm] "TSOP, 44-Leads, Body 18.42x10.16mm, Pitch 0.80mm, IPC Low Density"
  oval 1.4x0.6 smd: 1(-5.9,8.4) 2(-5.9,7.6) 3(-5.9,6.8) 4(-5.9,6) 5(-5.9,5.2) 6(-5.9,4.4) 7(-5.9,3.6) 8(-5.9,2.8) 9(-5.9,2) 10(-5.9,1.2) 11(-5.9,0.4) 12(-5.9,-0.4) 13(-5.9,-1.2) 14(-5.9,-2) 15(-5.9,-2.8) 16(-5.9,-3.6) 17(-5.9,-4.4) 18(-5.9,-5.2) 19(-5.9,-6) 20(-5.9,-6.8) 21(-5.9,-7.6) 22(-5.9,-8.4) 23(5.9,-8.4) 24(5.9,-7.6) 25(5.9,-6.8) 26(5.9,-6) 27(5.9,-5.2) 28(5.9,-4.4) 29(5.9,-3.6) 30(5.9,-2.8) 31(5.9,-2) 32(5.9,-1.2) 33(5.9,-0.4) 34(5.9,0.4) 35(5.9,1.2) 36(5.9,2) 37(5.9,2.8) 38(5.9,3.6) 39(5.9,4.4) 40(5.9,5.2) 41(5.9,6) 42(5.9,6.8) 43(5.9,7.6) 44(5.9,8.4)
  silkscreen extent -6.02,-9.3 4.8,9.37, body extent -5.88,-9.3 5.88,9.3, height 1.2
XAL7070-122 [mil] "Coilcraft High Temperature Shielded Power Inductors"
  rect 64x269 smd: 1(-93,0) 2(93,0)
  silkscreen extent -148,-154 148,165, body extent -152,-157 152,157, height 276